# Altium PCB Power_vac.PcbDoc (part 1 of 5)
Units mm, origin at the board's own origin, x right, y up, seen from the top; angles counter-clockwise.
Board outline 180 x 212 mm, 4 copper layers (Top Layer, Int1 (GND), Int2 (PWR), Bottom Layer), stack 2.01 mm thick; 296 components, 149 nets, 798 pads, 522 vias.
Unrouted connection lines stored in the file: 1.
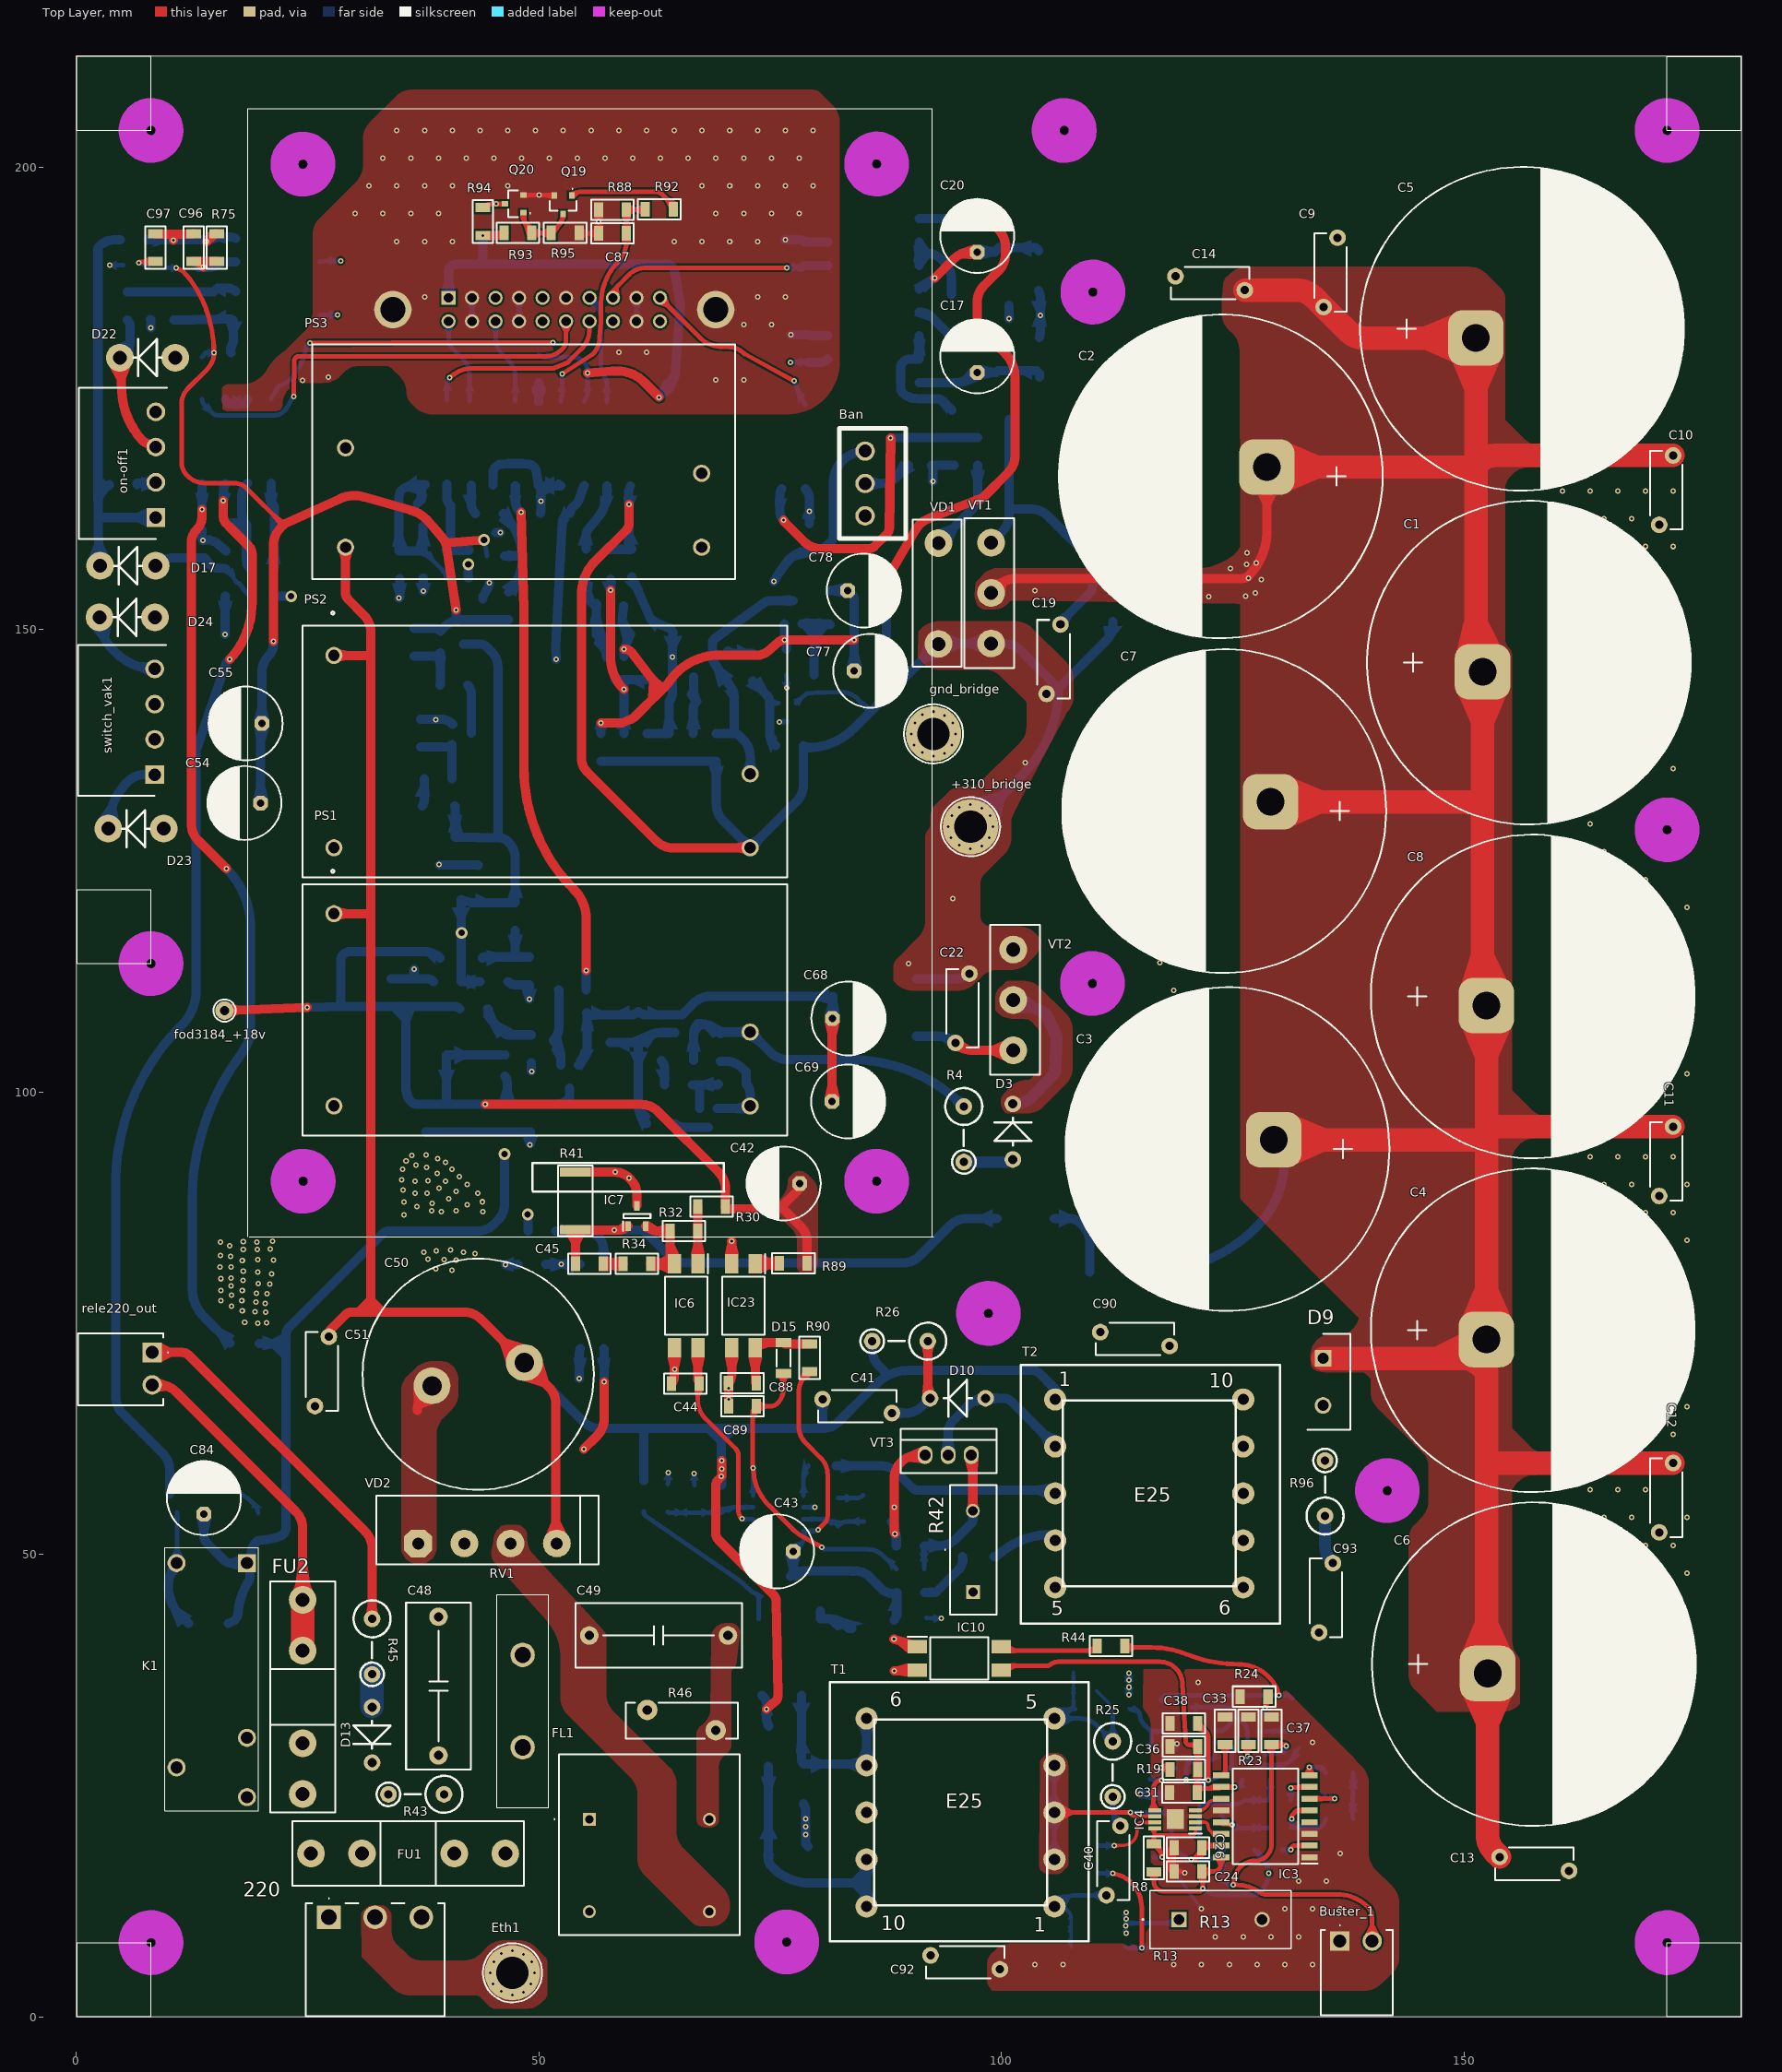
[diagram p0: Top Layer view]
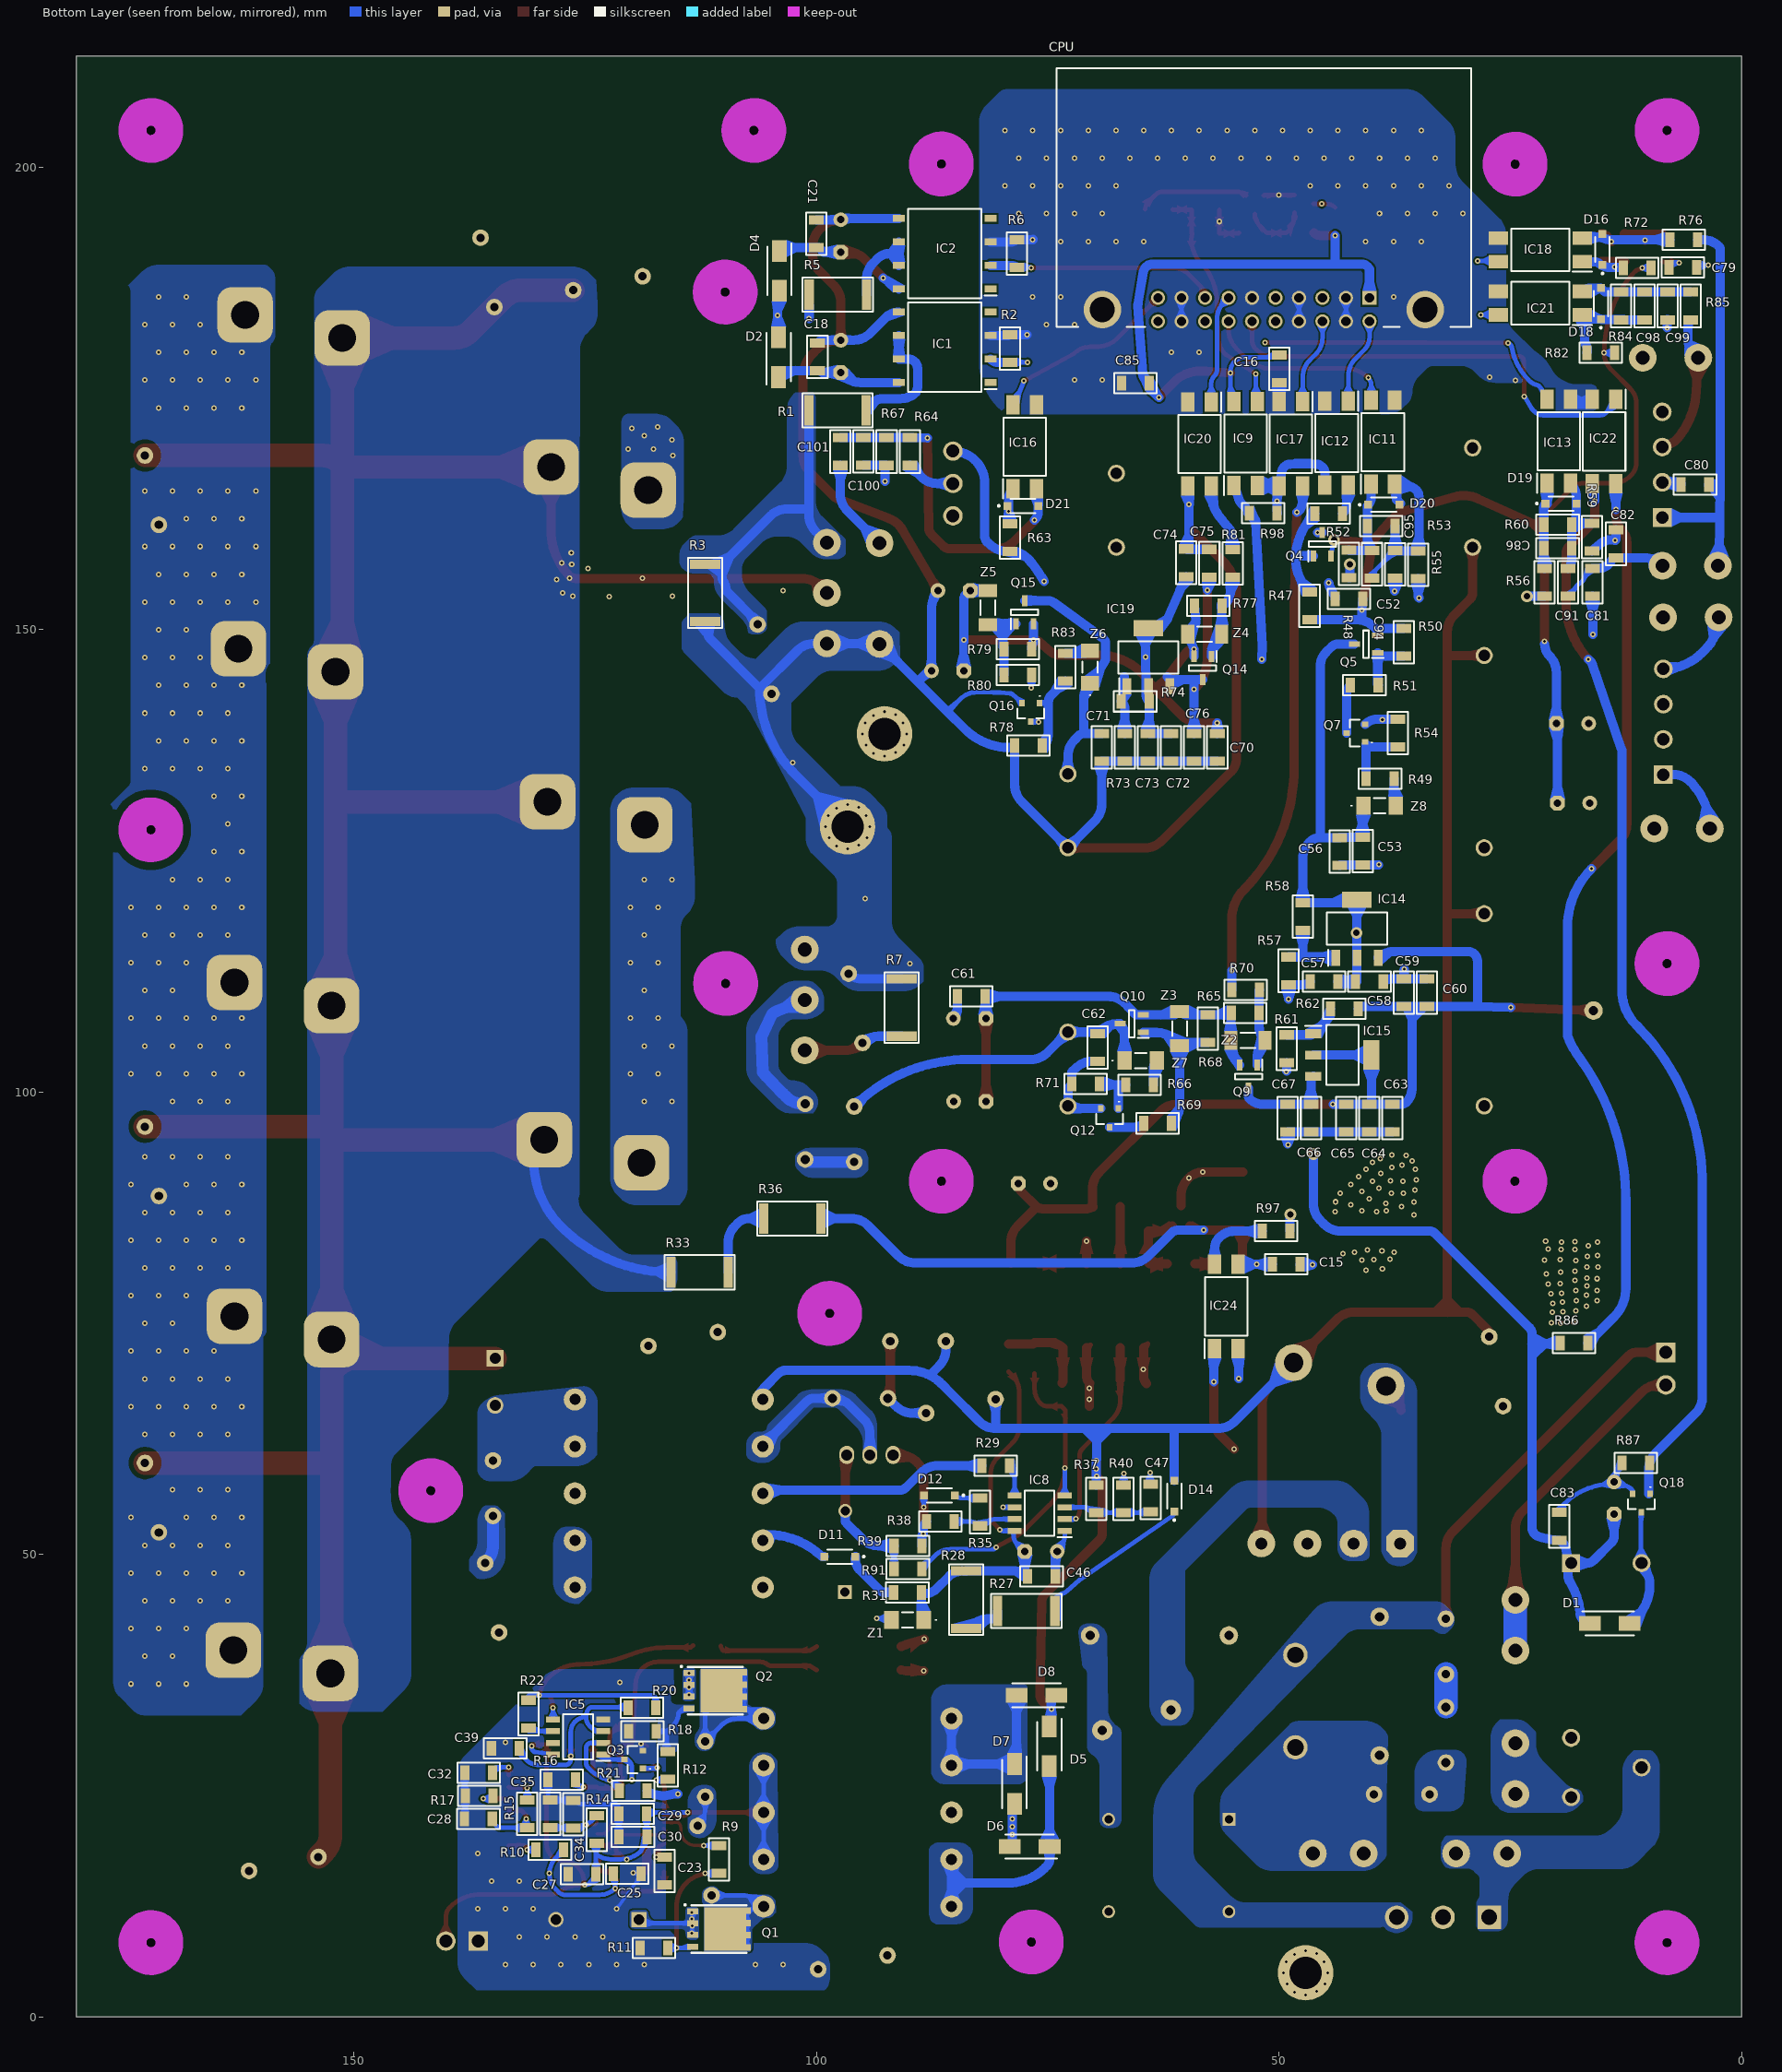
[diagram p1: Bottom Layer view, seen from below]
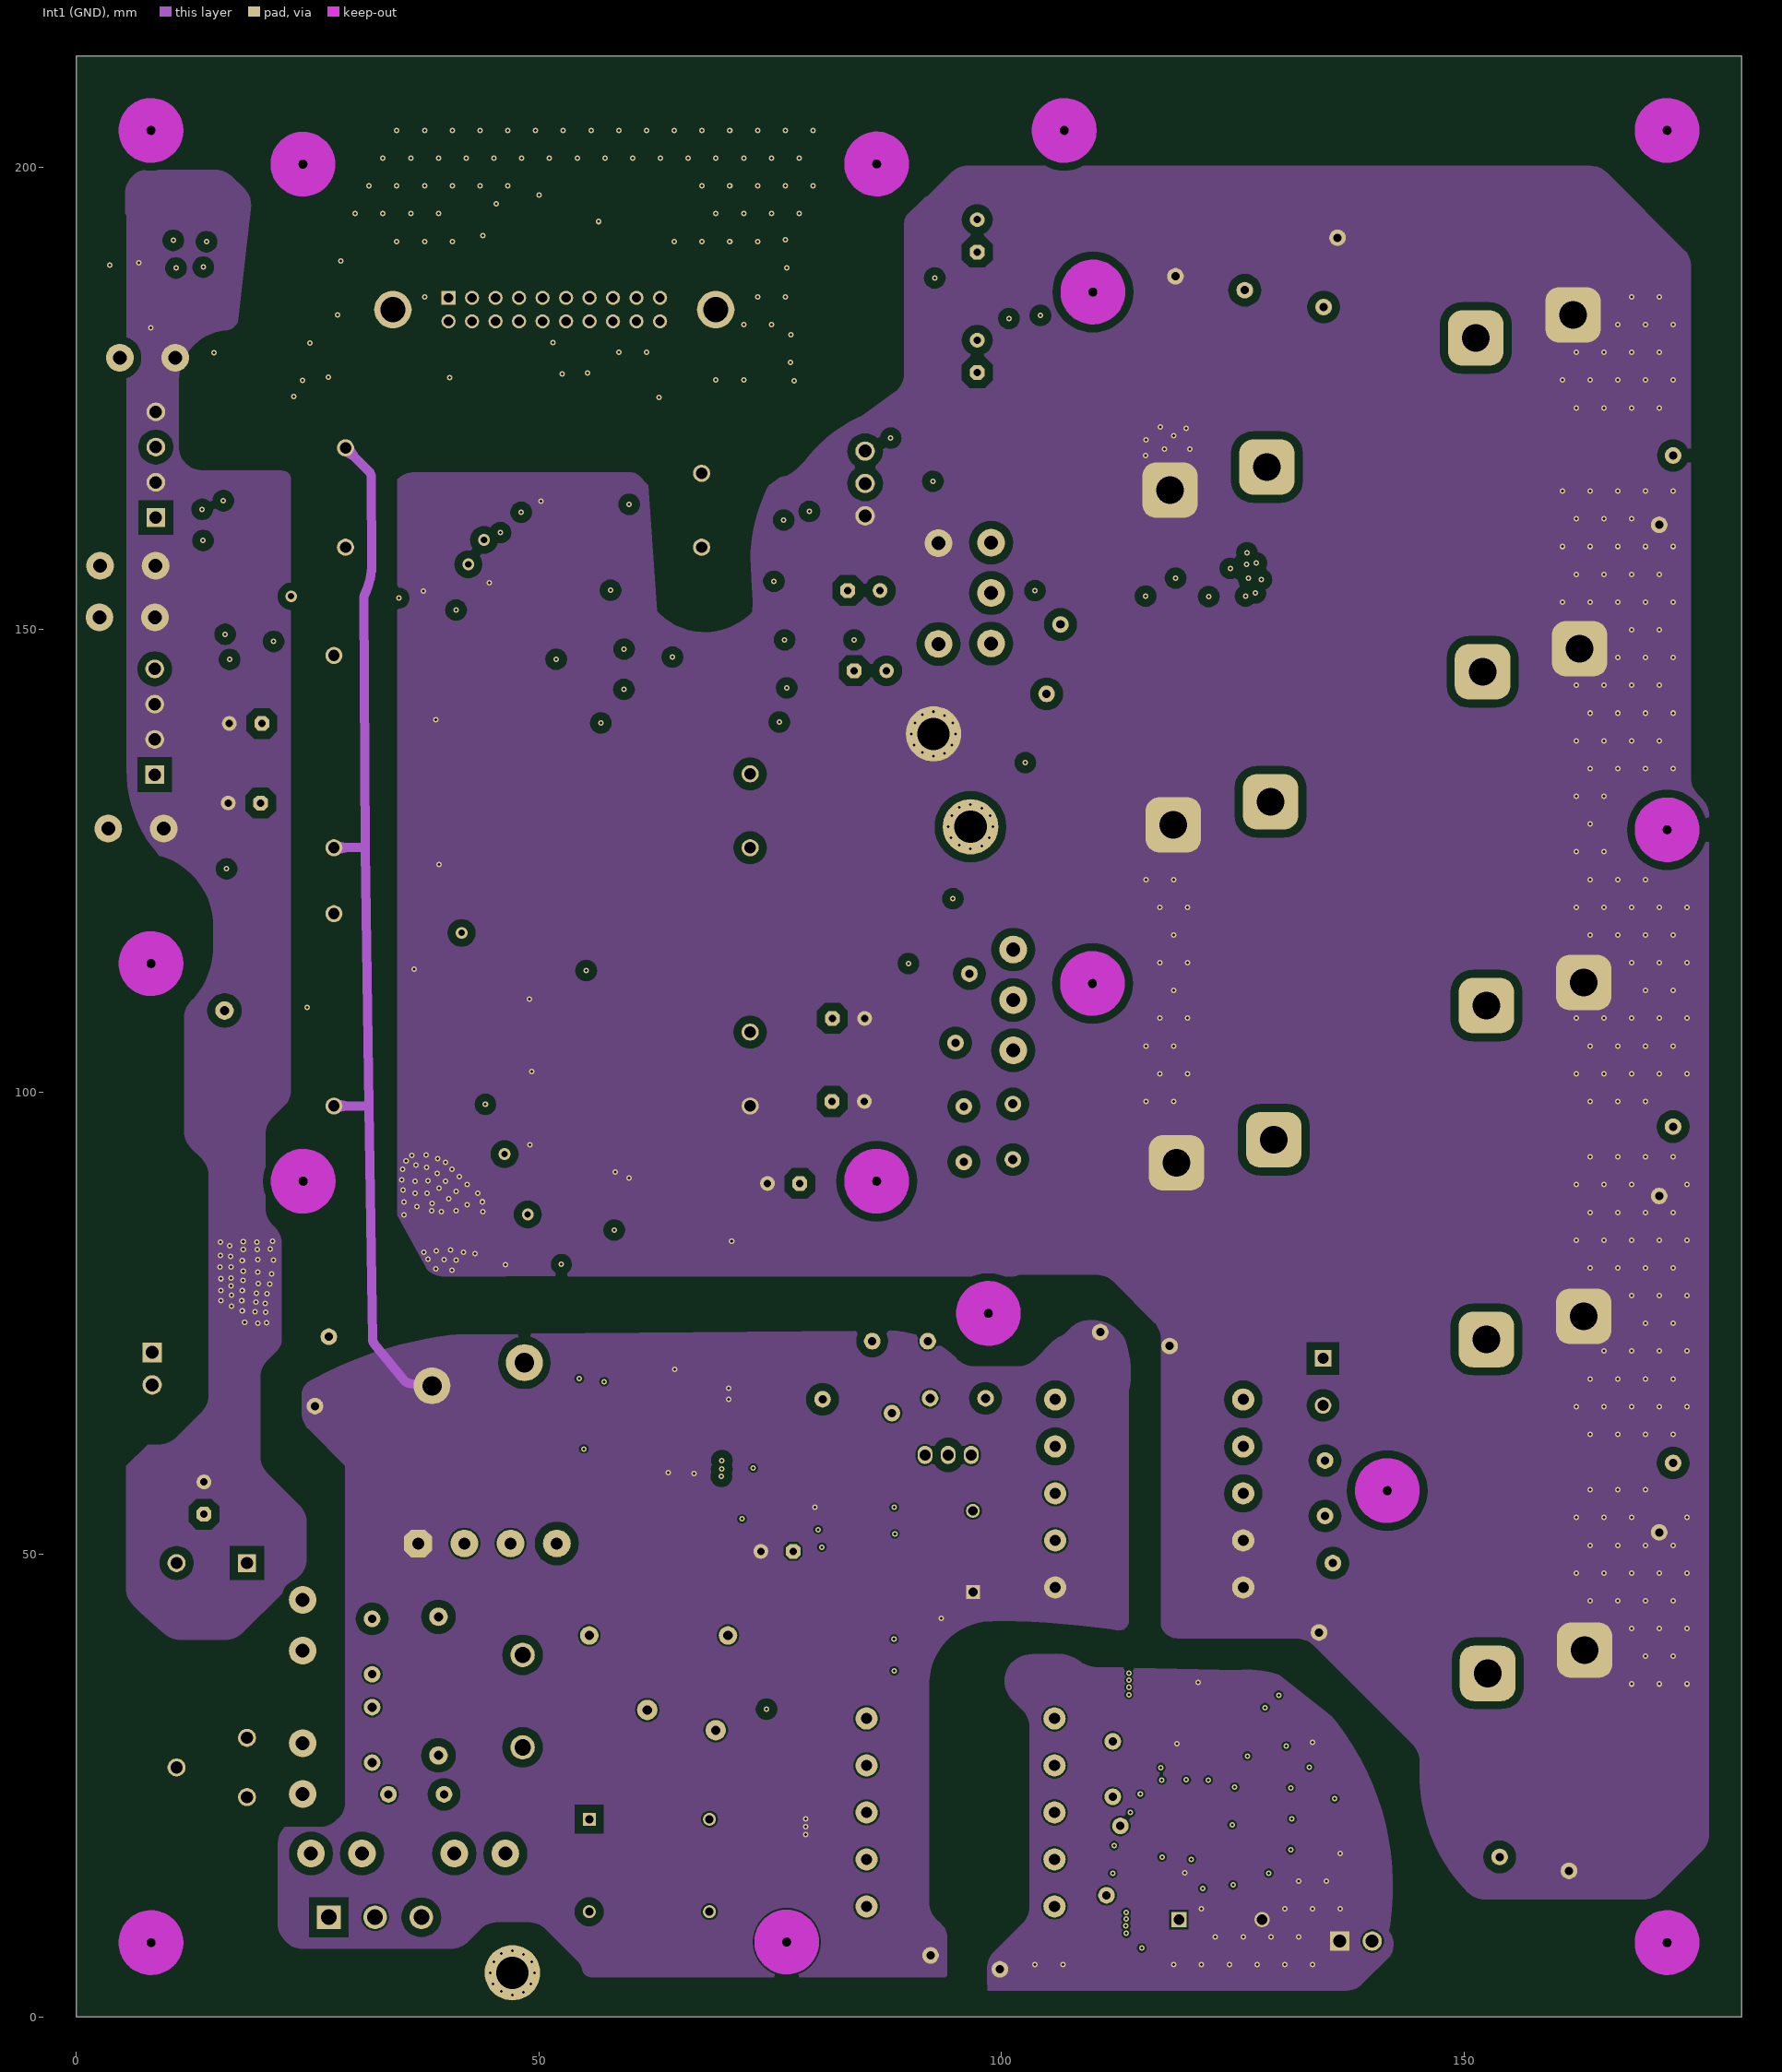
[diagram p2: Int1 (GND)]
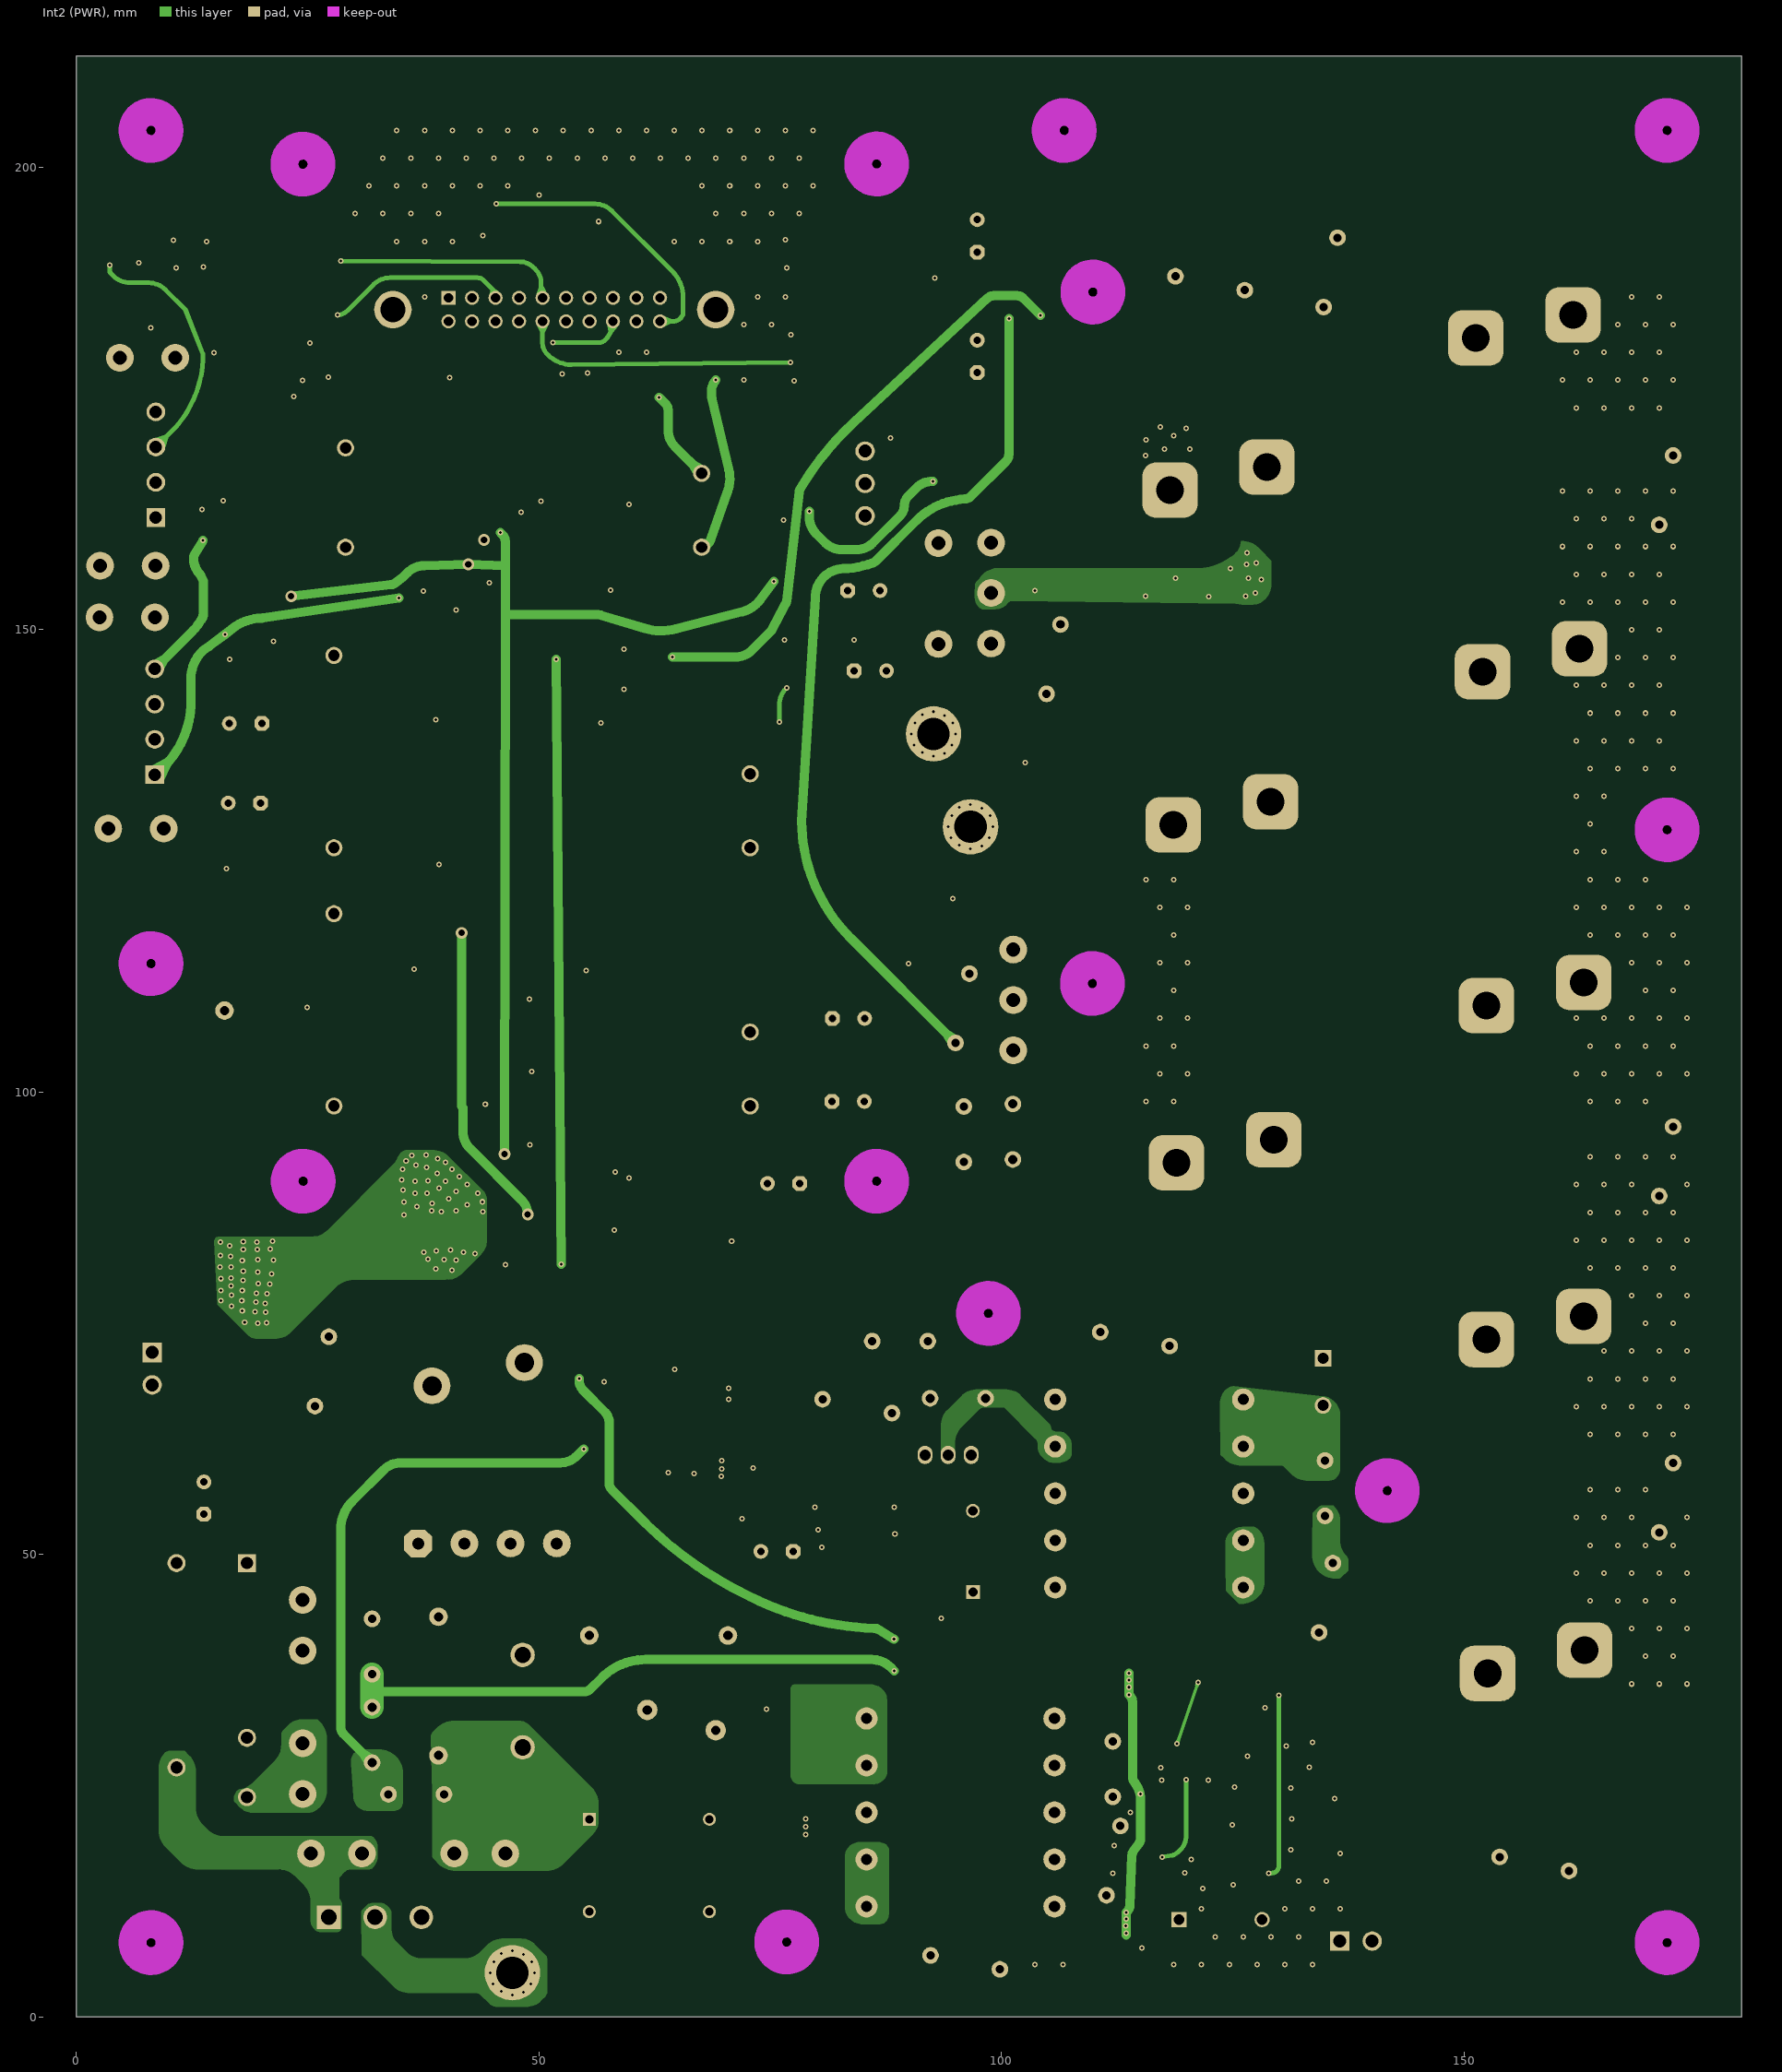
[diagram p3: Int2 (PWR)]
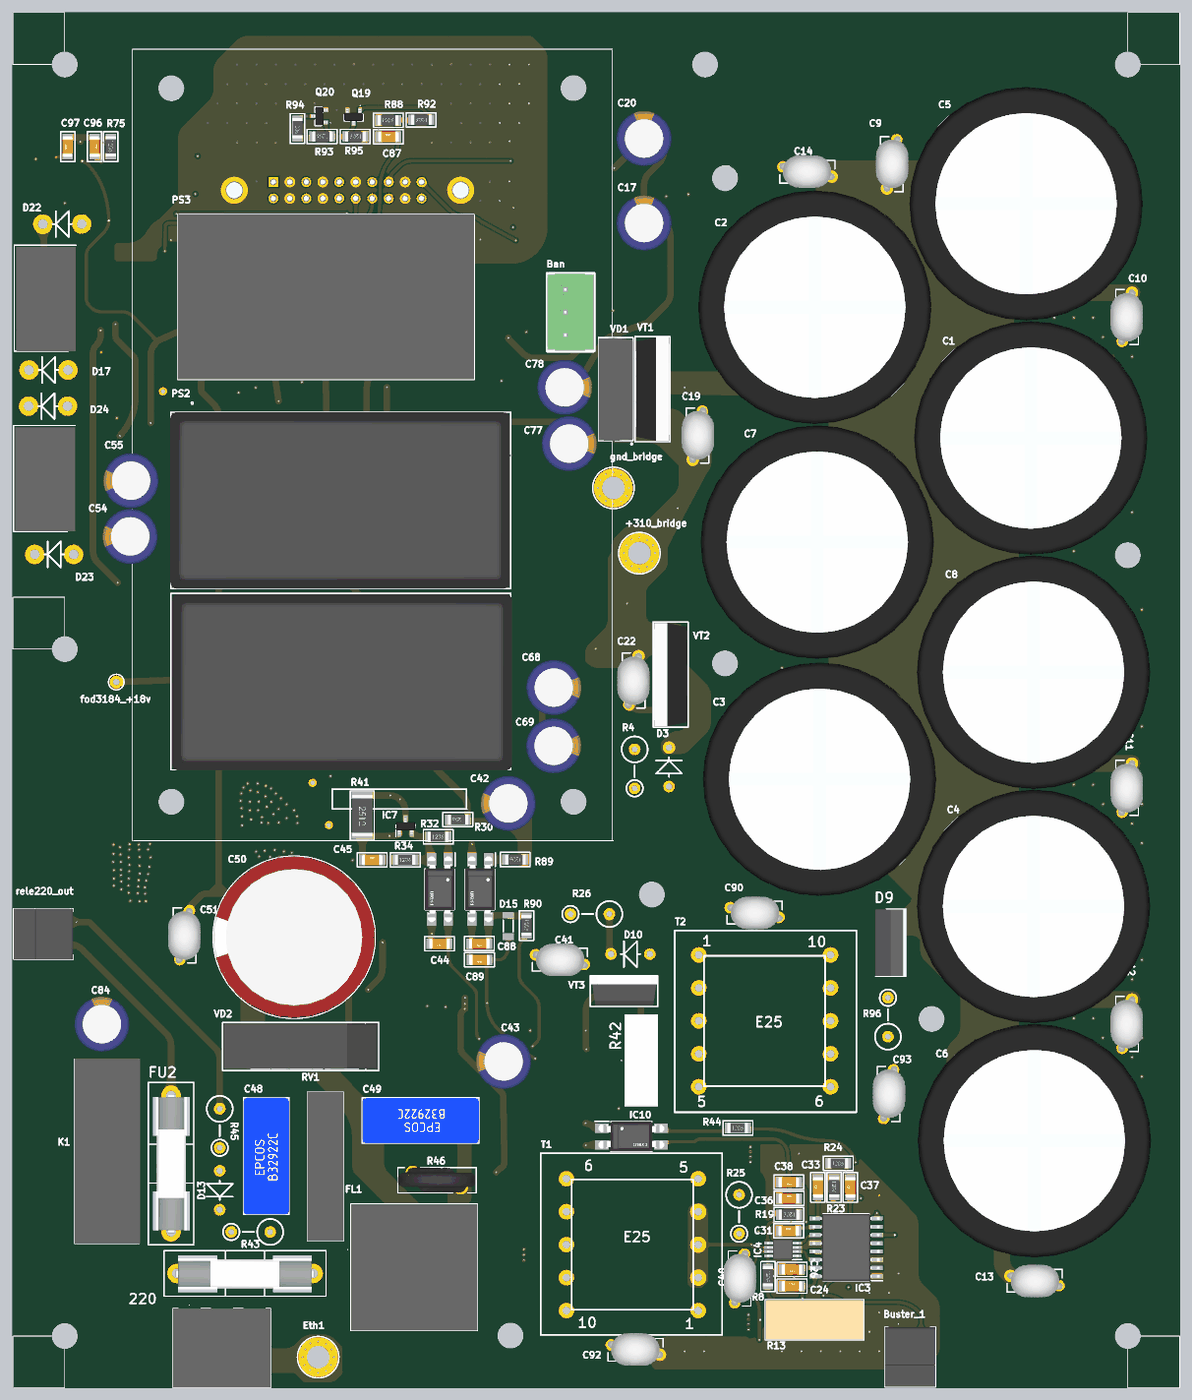
[diagram p7: 3D render of the assembled board from above, using the file's embedded part models]
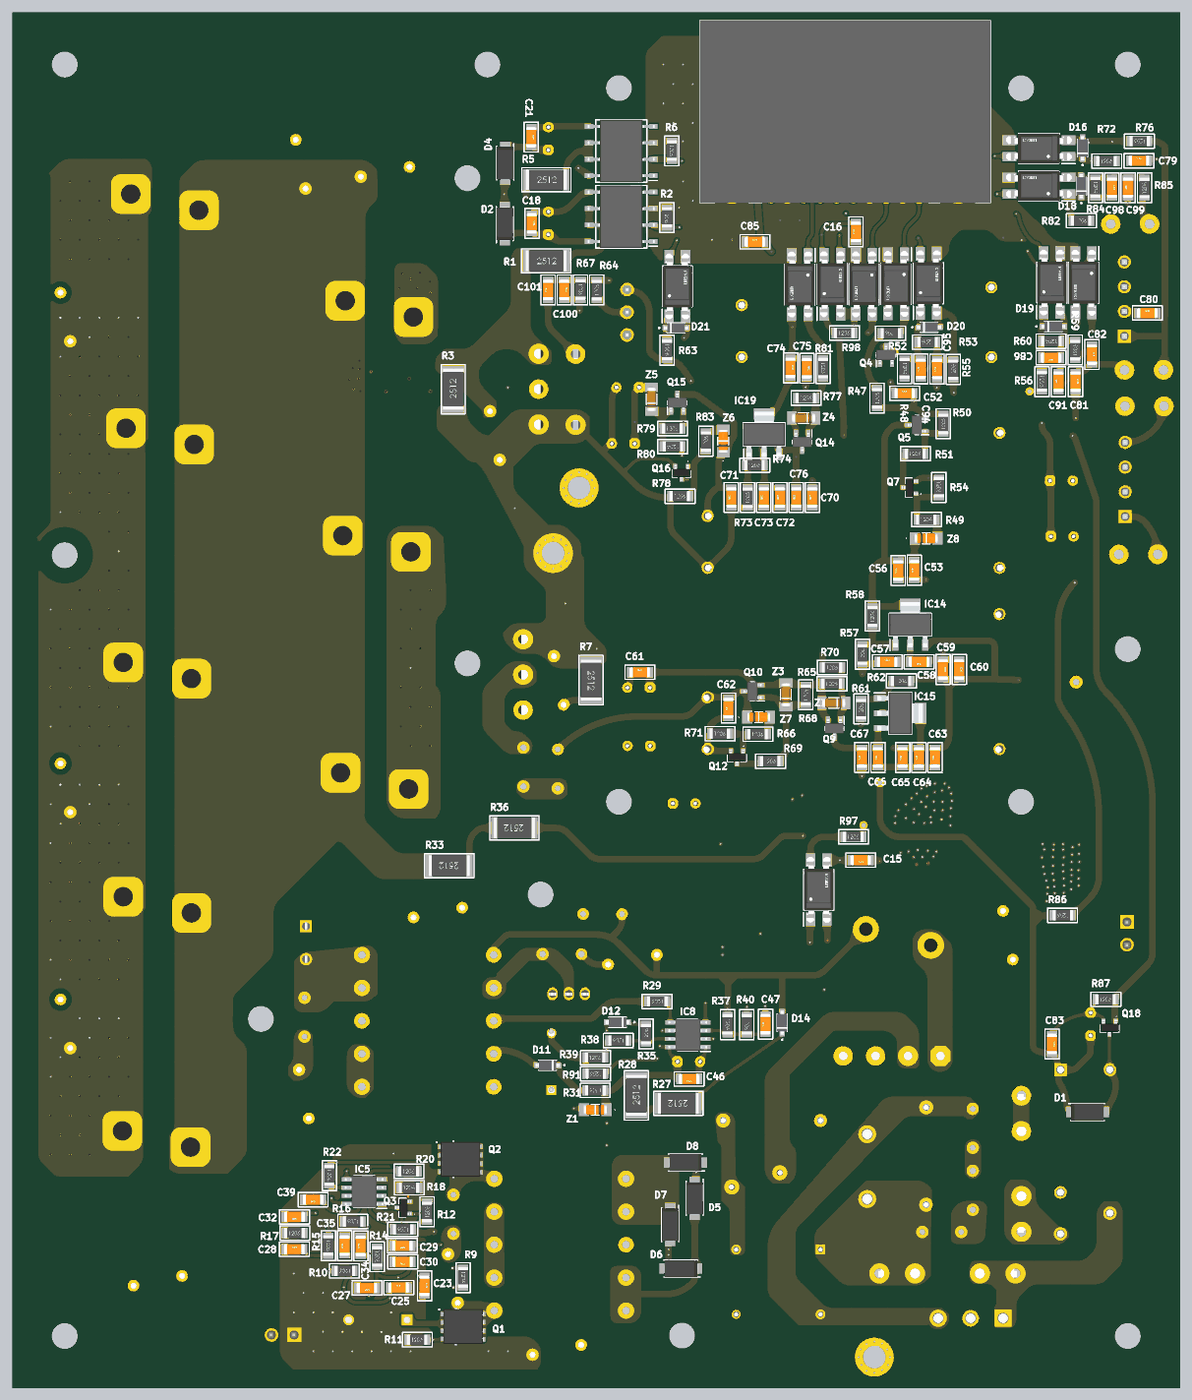
[diagram p8: 3D render of the assembled board from below, using the file's embedded part models]

## Layer stack, top to bottom
Top Solder: solder mask 0.0254, SM-001, Dk 4
Top Layer: signal copper 0.07
Dielectric 1: prepreg 0.2, PP-017, Dk 4.3
Dielectric 2: prepreg 0.2, PP-017, Dk 4.3
Int1 (GND): signal copper 0.035
Dielectric 3: core 1, Core-039, Dk 4.8
Int2 (PWR): signal copper 0.035
Dielectric 4: prepreg 0.2, PP-017, Dk 4.3
Dielectric 5: prepreg 0.2, PP-017, Dk 4.3
Bottom Layer: signal copper 0.07
Bottom Solder: solder mask 0.0254, SM-001, Dk 4

## Board outline
0,0 180,0 180,212 0,212
cut-out: 106.778,201.981 cw(c106.778,203.981) 104.778,203.981 cw(c106.778,203.981) 106.778,205.981 cw(c106.778,203.981) 108.778,203.981 cw(c106.778,203.981)
cut-out: 109.855,184.456 cw(c109.855,186.456) 107.855,186.456 cw(c109.855,186.456) 109.855,188.456 cw(c109.855,186.456) 111.855,186.456 cw(c109.855,186.456)
cut-out: 141.703,54.881 cw(c141.703,56.881) 139.703,56.881 cw(c141.703,56.881) 141.703,58.881 cw(c141.703,56.881) 143.703,56.881 cw(c141.703,56.881)
cut-out: 109.855,109.681 cw(c109.855,111.681) 107.855,111.681 cw(c109.855,111.681) 109.855,113.681 cw(c109.855,111.681) 111.855,111.681 cw(c109.855,111.681)
cut-out: 171.953,201.981 cw(c171.953,203.981) 169.953,203.981 cw(c171.953,203.981) 171.953,205.981 cw(c171.953,203.981) 173.953,203.981 cw(c171.953,203.981)
cut-out: 171.953,126.35 ccw(c171.953,128.35) 173.953,128.35 ccw(c171.953,128.35) 171.953,130.35 ccw(c171.953,128.35) 169.953,128.35 ccw(c171.953,128.35)
cut-out: 169.953,8.006 cw(c171.953,8.006) 171.953,10.006 cw(c171.953,8.006) 173.953,8.006 cw(c171.953,8.006) 171.953,6.006 cw(c171.953,8.006)
cut-out: 98.578,74.056 cw(c98.578,76.056) 96.578,76.056 cw(c98.578,76.056) 98.578,78.056 cw(c98.578,76.056) 100.578,76.056 cw(c98.578,76.056)
cut-out: 86.5,88.35 ccw(c86.5,90.35) 88.5,90.35 ccw(c86.5,90.35) 86.5,92.35 ccw(c86.5,90.35) 84.5,90.35 ccw(c86.5,90.35)
cut-out: 86.5,198.35 cw(c86.5,200.35) 84.5,200.35 cw(c86.5,200.35) 86.5,202.35 cw(c86.5,200.35) 88.5,200.35 cw(c86.5,200.35)
cut-out: 24.475,198.325 ccw(c24.475,200.325) 26.475,200.325 ccw(c24.475,200.325) 24.475,202.325 ccw(c24.475,200.325) 22.475,200.325 ccw(c24.475,200.325)
cut-out: 8.05,201.981 cw(c8.05,203.981) 6.05,203.981 cw(c8.05,203.981) 8.05,205.981 cw(c8.05,203.981) 10.05,203.981 cw(c8.05,203.981)
cut-out: 76.775,6.075 cw(c76.775,8.075) 74.775,8.075 cw(c76.775,8.075) 76.775,10.075 cw(c76.775,8.075) 78.775,8.075 cw(c76.775,8.075)
cut-out: 22.5,90.35 cw(c24.5,90.35) 24.5,92.35 cw(c24.5,90.35) 26.5,90.35 cw(c24.5,90.35) 24.5,88.35 cw(c24.5,90.35)
cut-out: 8.053,111.881 cw(c8.053,113.881) 6.053,113.881 cw(c8.053,113.881) 8.053,115.881 cw(c8.053,113.881) 10.053,113.881 cw(c8.053,113.881)
cut-out: 6.053,8.006 cw(c8.053,8.006) 8.053,10.006 cw(c8.053,8.006) 10.053,8.006 cw(c8.053,8.006) 8.053,6.006 cw(c8.053,8.006)

## Design rules (kind name [scope] priority, off if disabled: settings)
AcuteAngle [All] p1: minimum=3.50000000000000E+0001 checktracksonly=FALSE
BoardOutlineClearance "BoardOutlineClearance 1" [OnCopper] p1: gap=0.5 ignorepadtopadclearanceinfootprint=FALSE except(0: Text-SplitContinuation; 0.25: Text-OutlineEdge Text-CavityEdge Text-CutoutEdge Text-SplitBarrior) // Milling
BoardOutlineClearance "BoardOutlineClearance 2" [All] p2 off: gap=0.4 ignorepadtopadclearanceinfootprint=FALSE except(0: Arc-SplitContinuation Track-SplitContinuation SMDPad-SplitContinuation THPad-SplitContinuation Via-SplitContinuation Fill-SplitContinuation Poly-SplitContinuation Region-SplitContinuation Text-SplitContinuation) // V-Cut
Clearance Clearance_310v [InNetClass('310v')] p1: gap=0.85 ignorepadtopadclearanceinfootprint=FALSE except(0.1: Text-Text; 0.25: Text-Hole)
Clearance "Clearance-1 1 Oz" [All] p2: gap=0.2 ignorepadtopadclearanceinfootprint=TRUE except(0.25: Arc-Hole Track-Hole SMDPad-Hole THPad-Hole Via-Hole Fill-Hole Poly-Hole Region-Hole Text-Hole) // Standart
Clearance "Clearance 3 Oz" [All] p3: gap=0.35 ignorepadtopadclearanceinfootprint=FALSE except(0.25: Arc-Hole Track-Hole SMDPad-Hole THPad-Hole Via-Hole Fill-Hole Poly-Hole Region-Hole Text-Hole)
Clearance "Clearance 2 Oz" [All] p4: gap=0.3 ignorepadtopadclearanceinfootprint=FALSE except(0.25: Arc-Hole Track-Hole SMDPad-Hole THPad-Hole Via-Hole Fill-Hole Poly-Hole Region-Hole Text-Hole)
Clearance "Clearance-2 1 Oz" [All] p5: gap=0.15 ignorepadtopadclearanceinfootprint=FALSE except(0.2: Arc-Fill Arc-Poly Track-Fill Track-Poly SMDPad-Fill SMDPad-Poly THPad-Fill THPad-Poly Via-Fill Via-Poly Fill-Fill Fill-Poly Poly-Poly; 0.25: Arc-Hole Track-Hole SMDPad-Hole THPad-Hole Via-Hole Fill-Hole Poly-Hole Region-Hole Text-Hole) // Advance
Clearance "Clearance-1 1/2 Oz" [All] p6: gap=0.125 ignorepadtopadclearanceinfootprint=FALSE except(0.2: Arc-Fill Arc-Poly Track-Fill Track-Poly SMDPad-SMDPad SMDPad-Fill SMDPad-Poly THPad-Fill THPad-Poly Via-Fill Via-Poly Fill-Fill Fill-Poly Poly-Poly Poly-Region Poly-Text; 0.25: Arc-Hole Track-Hole SMDPad-Hole THPad-Hole Via-Hole Fill-Hole Poly-Hole Region-Hole Text-Hole) // Standart
Clearance "Clearance-2 1/2 Oz" [All] p7: gap=0.1 ignorepadtopadclearanceinfootprint=FALSE except(0.15: Arc-Fill Arc-Poly Track-Fill Track-Poly SMDPad-SMDPad SMDPad-Fill SMDPad-Poly THPad-Fill THPad-Poly Via-Fill Via-Poly Fill-Fill Fill-Poly Poly-Poly Poly-Region Poly-Text; 0.25: Arc-Hole Track-Hole SMDPad-Hole THPad-Hole Via-Hole Fill-Hole Poly-Hole Region-Hole Text-Hole) // Advance
ComponentClearance [All] p1: gap=0.1 collisioncheckmode=3 verticalgap=0 showdistances=FALSE
DiffPairsRouting "DiffPairsRouting 1 Oz" [All] p1: maxlimit=0.254 minlimit=0.2 mostfreqgap=0.254 toplayer_minwidth=0.2 toplayer_maxwidth=0.381 toplayer_prefwidth=0.381 midlayer1_minwidth=0.2 midlayer1_maxwidth=0.381 midlayer1_prefwidth=0.381 midlayer2_minwidth=0.2 midlayer2_maxwidth=0.381 midlayer2_prefwidth=0.381 bottomlayer_minwidth=0.2 bottomlayer_maxwidth=0.381 bottomlayer_prefwidth=0.381 maxuncoupledlength=12.7
DiffPairsRouting "DiffPairsRouting 1/2 Oz" [All] p2: maxlimit=0.254 minlimit=0.1 mostfreqgap=0.254 toplayer_minwidth=0.1 toplayer_maxwidth=0.381 toplayer_prefwidth=0.381 midlayer1_minwidth=0.1 midlayer1_maxwidth=0.381 midlayer1_prefwidth=0.381 midlayer2_minwidth=0.1 midlayer2_maxwidth=0.381 midlayer2_prefwidth=0.381 bottomlayer_minwidth=0.1 bottomlayer_maxwidth=0.381 bottomlayer_prefwidth=0.381 maxuncoupledlength=12.7
Height [All] p1: minheight=0 maxheight=60 prefheight=30
HoleSize "Minimum HoleSize" [IsPad] p1: absolutevalues=TRUE maxlimit=9 minlimit=0.3 maxpercent=80.000 minpercent=20.000
HoleSize "Minimum HoleSize VIA 1" [IsVia] p2: absolutevalues=TRUE maxlimit=5.9 minlimit=0.3 maxpercent=80.000 minpercent=20.000 // Standart
HoleSize "Minimum HoleSize VIA 2" [IsVia] p3: absolutevalues=TRUE maxlimit=5.9 minlimit=0.2 maxpercent=80.000 minpercent=20.000 // Advance
HoleToHoleClearance Hole2HoleClearance [All] p1: gap=0.25 allowstackedmicrovias=FALSE
MinimumAnnularRing "Minimum AR VIA Standart" [IsVia] p1: minimumring=0.1
MinimumAnnularRing "Minimum AR PAD Standart" [IsPAD] p2 off: minimumring=0.2
MinimumAnnularRing "Minimum AR VIA Advance" [IsVia] p3 off: minimumring=0.1
MinimumAnnularRing "Minimum AR PAD Advance" [IsPAD] p4 off: minimumring=0.15
MinimumSolderMaskSliver "SolderMask Bridge Standart" [All] p1: minsoldermaskwidth=0.1 // All Masks
MinimumSolderMaskSliver "SolderMask Bridge Advance" [All] p2: minsoldermaskwidth=0.1 // Mask LDI
PlaneClearance "PlaneClearance 3 Oz" [All] p1: clearance=0.35
PlaneClearance "PlaneClearance 2 Oz" [All] p2: clearance=0.3
PlaneClearance "PlaneClearance 1 Oz" [All] p3: clearance=0.2
PlaneClearance "PlaneClearance-1 1/2 Oz" [All] p4: clearance=0.2 // Standart
PlaneClearance "PlaneClearance-2 1/2 Oz" [All] p5: clearance=0.15 // Advance
PlaneConnect "TermalConnect 3 Oz" [All] p1: planeconnectstyle=Direct reliefexpansion=0.2 reliefentries=4 reliefconductorwidth=0.35 reliefairgap=0.35 // Standart
PlaneConnect "TermalConnect 2 Oz" [All] p2: planeconnectstyle=Relief reliefexpansion=0.2 reliefentries=4 reliefconductorwidth=0.3 reliefairgap=0.3 // Standart
PlaneConnect "TermalConnect-1 1 Oz" [All] p3: planeconnectstyle=Relief reliefexpansion=0.2 reliefentries=4 reliefconductorwidth=0.2 reliefairgap=0.2 // Standart
PlaneConnect "TermalConnect-2 1 Oz" [All] p4: pad.planeconnectstyle=Relief pad.reliefexpansion=0.15 pad.reliefentries=4 pad.reliefconductorwidth=0.2 pad.reliefairgap=0.2 via.planeconnectstyle=Direct via.reliefexpansion=0.15 via.reliefentries=4 via.reliefconductorwidth=0.15 via.reliefairgap=0.15 // Advance
PlaneConnect "TermalConnect-1 1/2 Oz" [All] p5: planeconnectstyle=Direct reliefexpansion=0.2 reliefentries=4 reliefconductorwidth=0.2 reliefairgap=0.2 // Standart
PlaneConnect "TermalConnect-2 1/2 Oz" [All] p6: pad.planeconnectstyle=Relief pad.reliefexpansion=0.15 pad.reliefentries=4 pad.reliefconductorwidth=0.15 pad.reliefairgap=0.15 via.planeconnectstyle=Direct via.reliefexpansion=0.15 via.reliefentries=4 via.reliefconductorwidth=0.15 via.reliefairgap=0.15 // Advance
PolygonConnect "PolygonConnect 3 Oz" [All] p1: connectstyle=Direct reliefconductorwidth=0.35 reliefentries=4 polygonreliefangle="90 Angle" airgapwidth=0.35
PolygonConnect "PolygonConnect 2 Oz" [All] p2: thpad.connectstyle=Relief thpad.reliefconductorwidth=0.3 thpad.reliefentries=4 thpad.polygonreliefangle="90 Angle" thpad.airgapwidth=0.3 smdpad.connectstyle=Relief smdpad.reliefconductorwidth=0.3 smdpad.reliefentries=4 smdpad.polygonreliefangle="90 Angle" smdpad.airgapwidth=0.3 via.connectstyle=Direct via.reliefconductorwidth=0.254 via.reliefentries=4 via.polygonreliefangle="90 Angle" via.airgapwidth=0.254
PolygonConnect "PolygonConnect-1 1 Oz" [All] p3: thpad.connectstyle=Relief thpad.reliefconductorwidth=0.2 thpad.reliefentries=4 thpad.polygonreliefangle="90 Angle" thpad.airgapwidth=0.2 smdpad.connectstyle=Relief smdpad.reliefconductorwidth=0.2 smdpad.reliefentries=4 smdpad.polygonreliefangle="90 Angle" smdpad.airgapwidth=0.2 via.connectstyle=Direct via.reliefconductorwidth=0.254 via.reliefentries=4 via.polygonreliefangle="90 Angle" via.airgapwidth=0.254 // Standart
PolygonConnect "PolygonConnect-2 1 Oz" [All] p4: thpad.connectstyle=Relief thpad.reliefconductorwidth=0.15 thpad.reliefentries=4 thpad.polygonreliefangle="90 Angle" thpad.airgapwidth=0.15 smdpad.connectstyle=Relief smdpad.reliefconductorwidth=0.15 smdpad.reliefentries=4 smdpad.polygonreliefangle="90 Angle" smdpad.airgapwidth=0.15 via.connectstyle=Direct via.reliefconductorwidth=0.254 via.reliefentries=4 via.polygonreliefangle="90 Angle" via.airgapwidth=0.254 // Advance
PolygonConnect "PolygonConnect-1 1/2 Oz" [All] p5: thpad.connectstyle=Relief thpad.reliefconductorwidth=0.15 thpad.reliefentries=4 thpad.polygonreliefangle="90 Angle" thpad.airgapwidth=0.2 smdpad.connectstyle=Relief smdpad.reliefconductorwidth=0.2 smdpad.reliefentries=4 smdpad.polygonreliefangle="90 Angle" smdpad.airgapwidth=0.2 via.connectstyle=Direct via.reliefconductorwidth=0.254 via.reliefentries=4 via.polygonreliefangle="90 Angle" via.airgapwidth=0.254 // Standart
PolygonConnect "PolygonConnect-2 1/2 Oz" [All] p6: thpad.connectstyle=Relief thpad.reliefconductorwidth=0.125 thpad.reliefentries=4 thpad.polygonreliefangle="90 Angle" thpad.airgapwidth=0.15 smdpad.connectstyle=Relief smdpad.reliefconductorwidth=0.125 smdpad.reliefentries=4 smdpad.polygonreliefangle="90 Angle" smdpad.airgapwidth=0.15 via.connectstyle=Direct via.reliefconductorwidth=0.254 via.reliefentries=4 via.polygonreliefangle="90 Angle" via.airgapwidth=0.254 // Advance
RoutingCorners [All] p1 off: cornerstyle=45-Degree minsetback=2.54 maxsetback=2.54
RoutingVias [All] p1: holewidth=0.3 width=0.6 viastyle="Through Hole" minholewidth=0.2 minwidth=0.4 maxholewidth=5.9 maxwidth=6.4
SilkToSilkClearance Silk2SilkClearance [All] p1 off: silktosilkclearance=0.15
SilkToSolderMaskClearance Silk2SolderMaskClearance [IsPad] p1 off: minsilkscreentomaskgap=0.1 clearancetoexposedcopper=TRUE
SolderMaskExpansion SolderMaskExpansion-1 [All] p1: expansion=0.05 istentingtop=FALSE // Standart
SolderMaskExpansion "SolderMaskExpansion LDI" [All] p2: expansion=0.025 istentingtop=FALSE // Advance
SupplyNets "Schematic Supply Nets_2" [InNet('Eth')] p1: voltage=0.000
SupplyNets "Schematic Supply Nets_4" [InNet('GND_N')] p2: voltage=0.000
SupplyNets "Schematic Supply Nets_3" [InNet('GND_akum')] p3: voltage=0.000
SupplyNets "Schematic Supply Nets_1" [InNet('GND_digit')] p4: voltage=0.000
SupplyNets "Schematic Supply Nets" [InNet('GND_force')] p5: voltage=0.000
UnRoutedNet [All] p1: checkbadconnections=TRUE
Width "Width 3 Oz" [All] p1: maxlimit=10 minlimit=0.35 preferedwidth=0.4 checkconnectedcopper=TRUE
Width "Width 2 Oz" [All] p2: maxlimit=10 minlimit=0.3 preferedwidth=0.35 minimp=50.000000 maximp=50.000000 favimp=50.000000 checkconnectedcopper=TRUE
Width "Width 1 Oz" [All] p3: maxlimit=10 minlimit=0.15 preferedwidth=0.2 checkconnectedcopper=TRUE
Width "Width 1/2 Oz" [All] p4: maxlimit=10 minlimit=0.1 preferedwidth=0.125 checkconnectedcopper=TRUE
18 further rules are at their usual default settings.

## Classes and differential pairs
net class 310v: 220_L 220_L_Fuse 220_N 310v GND_force NetD10_1 Out_310_to_bridge Power_trans
component class Remove_from_CPU_to_Power: C52 C53 C54 C55 C56 C57 C58 C59 C60 C61 C62 C63 C64 C65 C66 C67 C68 C69 C70 C71 C72 C73 C74 C75 C76 C77 C78 C83 C84 C86 C91 C94 C95 C96 C97 C98 C99 C100 C101 D1 D16 D17 D18 D19 D20 D21 D22 D23 D24 FU2 IC11 IC12 IC13 IC14 IC15 IC16 IC17 IC18 IC19 IC20 IC21 IC22 K1 Q4 Q5 Q7 Q9 Q10 Q12 Q14 Q15 Q16 Q18 R47 R48 R49 R50 R51 R52 R53 R54 R55 R56 R57 R58 R59 R60 R61 R62 R63 R64 R65 R66 R67 R68 R69 R70 R71 R72 R73 R74 R75 R76 R77 R78 R79 R80 R81 R82 R83 R84 R85 R86 R87 Z2 Z3 Z4 Z5 Z6 Z7 Z8
component class Transform_310_3_24_24: C85 PS1 PS2 PS3
component class Filtr_220: C48 C49 C50 C51 D14 FL1 FU1 R46 RV1 VD2
component class Transform_310_310: C41 C42 C43 C44 C45 C46 C47 C88 C89 C90 C93 D9 D10 D11 D12 D15 IC6 IC7 IC8 IC23 R26 R27 R28 R29 R30 R31 R32 R33 R34 R35 R36 R37 R38 R39 R40 R41 R42 R89 R90 R91 R96 T2 VT3 Z1
component class Transform_12_310: C23 C24 C25 C26 C27 C28 C29 C30 C31 C32 C33 C34 C35 C36 C37 C38 C39 C40 C92 D5 D6 D7 D8 IC3 IC4 IC5 Q1 Q2 Q3 R8 R9 R10 R11 R12 R13 R14 R15 R16 R17 R18 R19 R20 R21 R22 R23 R24 R25 T1
component class Detect_220: C15 C16 C87 D13 IC9 IC10 IC24 Q19 Q20 R43 R44 R45 R88 R92 R93 R94 R95 R97 R98
component class Hard_rele_310v_24v_test: C17 C18 C19 C20 C21 C22 D2 D3 D4 IC1 IC2 R1 R2 R3 R4 R5 R6 R7 VD1 VT1 VT2
component class Cnnectors_power1: 220 +310_bridge Ban Buster_1 C79 C80 C81 C82 CPU Eth1 fod3184_+18v gnd_bridge on-off1 rele220_out switch_vak1
component class Capasitors_vac: C1 C2 C3 C4 C5 C6 C7 C8 C9 C10 C11 C12 C13 C14

## Components (designator, comment, footprint, x,y, rotation, side; value= is the part's Value field where it differs from the comment)
220 "WJ2EDGR-5.0-3P" WJ2EDGR503P 27.275,10.75 r0 top
+310_bridge "Power connector, *, *" "CON: TH 3.5mm" 96.65,128.675 r90 top
Ban "Terminal connector, 3pin, 3.5mm, 300VAC, 10A" "CON: 15EDGVC-3.5-03 (or 691321100003)" 86.05,165.8 r270 top
Buster_1 "15EDGRC-3.5-02P-13-00AH" 15EDGRC3502P1300AH 136.575,8.175 r180 top
C1 "Aluminium capacitor, 680μF, 450V, ±20%, 54mOhm, 14x10x5 mm, -55...+105°C" "CAP: D35C10H40" 152,145.425 r0 top locked value=680μF
C2 "Aluminium capacitor, 680μF, 450V, ±20%, 54mOhm, 14x10x5 mm, -55...+105°C" "CAP: D35C10H40" 128.7,167.575 r180 top locked value=680μF
C3 "Aluminium capacitor, 680μF, 450V, ±20%, 54mOhm, 14x10x5 mm, -55...+105°C" "CAP: D35C10H40" 129.425,94.825 r180 top locked value=680μF
C4 "Aluminium capacitor, 680μF, 450V, ±20%, 54mOhm, 14x10x5 mm, -55...+105°C" "CAP: D35C10H40" 152.425,73.224 r0 top locked value=680μF
C5 "Aluminium capacitor, 680μF, 450V, ±20%, 54mOhm, 14x10x5 mm, -55...+105°C" "CAP: D35C10H40" 151.275,181.525 r0 top locked value=680μF
C6 "Aluminium capacitor, 680μF, 450V, ±20%, 54mOhm, 14x10x5 mm, -55...+105°C" "CAP: D35C10H40" 152.55,37.124 r0 top locked value=680μF
C7 "Aluminium capacitor, 680μF, 450V, ±20%, 54mOhm, 14x10x5 mm, -55...+105°C" "CAP: D35C10H40" 129.075,131.375 r180 top locked value=680μF
C8 "Aluminium capacitor, 680μF, 450V, ±20%, 54mOhm, 14x10x5 mm, -55...+105°C" "CAP: D35C10H40" 152.425,109.324 r0 top locked value=680μF
C9 "Film capacitor, 1n, 2kV, ±10%, 10.9mOhm, 31.5x15 mm, -40...+105°C" "CAP: AY2102M29Y5US63L7" 134.825,184.875 r90 top value=1n
C10 "Film capacitor, 1n, 2kV, ±10%, 10.9mOhm, 31.5x15 mm, -40...+105°C" "CAP: AY2102M29Y5US63L7" 172.6,168.825 r270 top value=1n
C11 "Film capacitor, 1n, 2kV, ±10%, 10.9mOhm, 31.5x15 mm, -40...+105°C" "CAP: AY2102M29Y5US63L7" 172.6,96.25 r270 top value=1n
C12 "Film capacitor, 1n, 2kV, ±10%, 10.9mOhm, 31.5x15 mm, -40...+105°C" "CAP: AY2102M29Y5US63L7" 172.6,59.875 r270 top value=1n
C13 "Film capacitor, 1n, 2kV, ±10%, 10.9mOhm, 31.5x15 mm, -40...+105°C" "CAP: AY2102M29Y5US63L7" 153.85,17.275 r0 top value=1n
C14 "Film capacitor, 1n, 2kV, ±10%, 10.9mOhm, 31.5x15 mm, -40...+105°C" "CAP: AY2102M29Y5US63L7" 126.3,186.7 r180 top value=1n
C15 "Ceramic capacitor, 100n, X7R, ±10%, 50V, 1206, -55...+125°C" "CAP: 1206" 49.225,81.35 r0 bottom value=100n
C16 "Ceramic capacitor, 60u, X7R, ±10%, 10v, 1206, -55...+125°C" "CAP: 1206" 49.975,178.2 r90 bottom value=60u
C17 "Aluminium capacitor, 100u, 25V, ±20%, 54mOhm, 14x10x5 mm, -55...+105°C" "CAP: D8C3.5H12" 97.375,179.55 r90 top value=100u
C18 "Ceramic capacitor, 1μF, X7R, ±10%, 50V, 1206, -55...+125°C" "CAP: 1206" 99.9,179.5 r270 bottom value=1μF
C19 "Film capacitor, 1n, 2kv, ±10%, 10.9mOhm, 31.5x15 mm, -40...+105°C" "CAP: AY2102M29Y5US63L7" 104.875,143.05 r90 top value=1n
C20 "Aluminium capacitor, 100u, 25V, ±20%, 54mOhm, 14x10x5 mm, -55...+105°C" "CAP: D8C3.5H12" 97.375,192.575 r90 top value=100u
C21 "Ceramic capacitor, 1μF, X7R, ±10%, 50V, 1206, -55...+125°C" "CAP: 1206" 100.025,192.8 r270 bottom value=1μF
C22 "Film capacitor, 1n, 2kv, ±10%, 10.9mOhm, 31.5x15 mm, -40...+105°C" "CAP: AY2102M29Y5US63L7" 96.525,112.8 r270 top value=1n
C23 "Ceramic capacitor, 2.2n, X7R, ±10%, 50V, 1206, -55...+125°C" "CAP: 1206" 116.45,15.749 r270 bottom value=2.2n
C24 "Ceramic capacitor, 1μF, X7R, ±10%, 50V, 1206, -55...+125°C" "CAP: 1206" 120.175,15.7 r0 top value=1μF
C25 "Ceramic capacitor, 0.1μF, X7R, ±10%, 50V, 1206, -55...+125°C" "CAP: 1206" 120.45,15.475 r180 bottom value=0.1μF
C26 "Ceramic capacitor, 100μF, X7R, ±10%, 50V, 1206, -55...+125°C" "CAP: 1206" 120.175,18.275 r180 top value=100μF
C27 "Ceramic capacitor, 0.1μF, X7R, ±10%, 50V, 1206, -55...+125°C" "CAP: 1206" 125.35,15.425 r0 bottom value=0.1μF
C28 "Ceramic capacitor, 1n, X7R, ±10%, 50V, 1206, -55...+125°C" "CAP: 1206" 136.55,21.375 r180 bottom value=1n
C29 "Ceramic capacitor, 0.1μF, X7R, ±10%, 50V, 1206, -55...+125°C" "CAP: 1206" 119.877,21.95 r0 bottom value=0.1μF
C30 "Ceramic capacitor, 1μF, X7R, ±10%, 50V, 1206, -55...+125°C" "CAP: 1206" 119.845,19.449 r0 bottom value=1μF
C31 "Ceramic capacitor, 1μF, X7R, ±10%, 50V, 1206, -55...+125°C" "CAP: 1206" 119.675,24.225 r0 top value=1μF
C32 "Ceramic capacitor, 2.2μF, X7R, ±10%, 50V, 1206, -55...+125°C" "CAP: 1206" 136.525,26.376 r0 bottom value=2.2μF
C33 "Ceramic capacitor, 0.1μF, X7R, ±10%, 50V, 1206, -55...+125°C" "CAP: 1206" 124.175,30.925 r90 top value=0.1μF
C34 "Ceramic capacitor, 0.1μF, X7R, ±10%, 50V, 1206, -55...+125°C" "CAP: 1206" 126.3,21.9 r90 bottom value=0.1μF
C35 "Ceramic capacitor, 100μF, X7R, ±10%, 50V, 1206, -55...+125°C" "CAP: 1206" 128.8,21.95 r90 bottom value=100μF
C36 "Ceramic capacitor, 0.1μF, X7R, ±10%, 50V, 1206, -55...+125°C" "CAP: 1206" 119.725,29.226 r0 top value=0.1μF
C37 "Ceramic capacitor, 0.1μF, X7R, ±10%, 50V, 1206, -55...+125°C" "CAP: 1206" 129.176,30.925 r90 top value=0.1μF
C38 "Ceramic capacitor, 1n, X7R, ±10%, 50V, 1206, -55...+125°C" "CAP: 1206" 119.7,31.726 r180 top value=1n
C39 "Ceramic capacitor, 10n, X7R, ±10%, 50V, 1206, -55...+125°C" "CAP: 1206" 133.65,29.028 r0 bottom value=10n
C40 "Film capacitor, 1n, 450VDC, ±10%, 10.9mOhm, 31.5x15 mm, -40...+105°C" "CAP: AY2102M29Y5US63L7" 111.352,13.128 r90 top value=1n
C41 "Film capacitor, 10n, 450VDC, ±10%, 10.9mOhm, 31.5x15 mm, -40...+105°C" "CAP: AY2102M29Y5US63L7" 80.65,66.775 r0 top value=10n
C42 "Aluminium capacitor, 100μF, 10v, ±20%, 54mOhm, 14x10x5 mm, -55...+105°C" "CAP: D8C3.5H12" 76.45,90.1 r180 top value=100μF
C43 "Aluminium capacitor, 100μF, 50v, ±20%, 54mOhm, 14x10x5 mm, -55...+105°C" "CAP: D8C3.5H12" 75.725,50.325 r180 top value=100μF
C44 "Ceramic capacitor, 2.2n, X7R, ±10%, 50V, 1206, -55...+125°C" "CAP: 1206" 65.825,68.475 r180 top value=2.2n
C45 "Ceramic capacitor, 100n, X7R, ±10%, 50V, 1206, -55...+125°C" "CAP: 1206" 55.45,81.4 r0 top value=100n
C46 "Ceramic capacitor, 220n, X7R, ±10%, 50V, 1206, -55...+125°C" "CAP: 1206" 75.675,47.625 r0 bottom value=220n
C47 "Ceramic capacitor, 1n, X7R, ±10%, 50V, 1206, -55...+125°C" "CAP: 1206" 63.9,56.075 r90 bottom value=1n
C48 "Film capacitor, 0.47, 310V, ±10%, 10.9mOhm, 31.5x15 mm, -40...+105°C" "CAP: B32922 (18x7x12.5mm)" 39.125,35.75 r90 top value=0.47
C49 "Film capacitor, 0.47, 310V, ±10%, 10.9mOhm, 31.5x15 mm, -40...+105°C" "CAP: B32922 (18x7x12.5mm)" 62.925,41.225 r180 top value=0.47
C50 "Aluminium capacitor, 330μF, 450V, ±20%, 54mOhm, 14x10x5 mm, -55...+105°C" "CAP: D25C10H50" 43.425,69.475 r180 top locked value=330μF
C51 "Film capacitor, 2.2n 1kv, 450VDC, ±10%, 10.9mOhm, 31.5x15 mm, -40...+105°C" "CAP: AY2102M29Y5US63L7" 27.275,73.525 r270 top value="2.2n 1kv"
C52 "Ceramic capacitor, 0.1μF, X7R, ±10%, 50V, 1206, -55...+125°C" "CAP: 1206" 42.45,153.3 r180 bottom value=0.1μF
C53 "Ceramic capacitor, 0.1μF, X7R, ±10%, 50V, 1206, -55...+125°C" "CAP: 1206" 40.95,126.05 r90 bottom value=0.1μF
C54 "Aluminium capacitor, 470μF, 25V, ±20%, 54mOhm, 14x10x5 mm, -55...+105°C" "CAP: D8C3.5H12" 18.15,131.25 r180 top value=470μF
C55 "Aluminium capacitor, 470μF, 25V, ±20%, 54mOhm, 14x10x5 mm, -55...+105°C" "CAP: D8C3.5H12" 18.275,139.845 r180 top value=470μF
C56 "Ceramic capacitor, 100n, X7R, ±10%, 50V, 1206, -55...+125°C" "CAP: 1206" 43.45,126 r90 bottom value=100n
C57 "Ceramic capacitor, 100μF, X7R, ±10%, 50V, 1206, -55...+125°C" "CAP: 1206" 45.126,111.925 r180 bottom value=100μF
C58 "Ceramic capacitor, 100μF, X7R, ±10%, 50V, 1206, -55...+125°C" "CAP: 1206" 40.226,111.925 r0 bottom value=100μF
C59 "Ceramic capacitor, 100μF, X7R, ±10%, 50V, 1206, -55...+125°C" "CAP: 1206" 36.525,110.75 r270 bottom value=100μF
C60 "Ceramic capacitor, 100n, X7R, ±10%, 50V, 1206, -55...+125°C" "CAP: 1206" 34.025,110.75 r270 bottom value=100n
C61 "Ceramic capacitor, 0.1μF, X7R, ±10%, 50V, 1206, -55...+125°C" "CAP: 1206" 83.275,110.325 r180 bottom value=0.1μF
C62 "Ceramic capacitor, 0.1μF, X7R, ±10%, 50V, 1206, -55...+125°C" "CAP: 1206" 69.6,104.8 r90 bottom value=0.1μF
C63 "Ceramic capacitor, 100n, X7R, ±10%, 50V, 1206, -55...+125°C" "CAP: 1206" 37.75,97.175 r90 bottom value=100n
C64 "Ceramic capacitor, 100μF, X7R, ±10%, 50V, 1206, -55...+125°C" "CAP: 1206" 40.25,97.175 r90 bottom value=100μF
C65 "Ceramic capacitor, 100μF, X7R, ±10%, 50V, 1206, -55...+125°C" "CAP: 1206" 42.751,97.175 r90 bottom value=100μF
C66 "Ceramic capacitor, 100μF, X7R, ±10%, 50V, 1206, -55...+125°C" "CAP: 1206" 46.55,97.175 r90 bottom value=100μF
C67 "Ceramic capacitor, 100n, X7R, ±10%, 50V, 1206, -55...+125°C" "CAP: 1206" 49.05,97.175 r90 bottom value=100n
C68 "Aluminium capacitor, 470μF, 25V, ±20%, 54mOhm, 14x10x5 mm, -55...+105°C" "CAP: D8C3.5H12" 83.45,107.95 r0 top value=470μF
C69 "Aluminium capacitor, 470μF, 25V, ±20%, 54mOhm, 14x10x5 mm, -55...+105°C" "CAP: D8C3.5H12" 83.425,98.973 r0 top value=470μF
C70 "Ceramic capacitor, 0.1μF, X7R, ±10%, 50V, 1206, -55...+125°C" "CAP: 1206" 56.675,137.25 r90 bottom value=0.1μF
C71 "Ceramic capacitor, 0.1μF, X7R, ±10%, 50V, 1206, -55...+125°C" "CAP: 1206" 69.176,137.25 r90 bottom value=0.1μF
C72 "Ceramic capacitor, 100n, X7R, ±10%, 50V, 1206, -55...+125°C" "CAP: 1206" 61.676,137.25 r90 bottom value=100n
C73 "Ceramic capacitor, 100μF, X7R, ±10%, 50V, 1206, -55...+125°C" "CAP: 1206" 64.176,137.25 r90 bottom value=100μF
C74 "Ceramic capacitor, 100μF, X7R, ±10%, 50V, 1206, -55...+125°C" "CAP: 1206" 60.025,157.225 r270 bottom value=100μF
C75 "Ceramic capacitor, 100μF, X7R, ±10%, 50V, 1206, -55...+125°C" "CAP: 1206" 57.525,157.175 r270 bottom value=100μF
C76 "Ceramic capacitor, 100n, X7R, ±10%, 50V, 1206, -55...+125°C" "CAP: 1206" 59.175,137.25 r90 bottom value=100n
C77 "Aluminium capacitor, 470μF, 25V, ±20%, 54mOhm, 14x10x5 mm, -55...+105°C" "CAP: D8C3.5H12" 85.825,145.55 r0 top value=470μF
C78 "Aluminium capacitor, 470μF, 25V, ±20%, 54mOhm, 14x10x5 mm, -55...+105°C" "CAP: D8C3.5H12" 85.125,154.225 r0 top value=470μF
C79 "Ceramic capacitor, 0.1μF, X7R, ±10%, 50V, 1206, -55...+125°C" "CAP: 1206" 6.325,189.15 r180 bottom value=0.1μF
C80 "Ceramic capacitor, 0.1μF, X7R, ±10%, 50V, 1206, -55...+125°C" "CAP: 1206" 5.025,165.7 r180 bottom value=0.1μF
C81 "Ceramic capacitor, 0.1μF, X7R, ±10%, 50V, 1206, -55...+125°C" "CAP: 1206" 16.1,155.1 r270 bottom value=0.1μF
C82 "Ceramic capacitor, 0.1μF, X7R, ±10%, 50V, 1206, -55...+125°C" "CAP: 1206" 13.575,159.275 r270 bottom value=0.1μF
C83 "Ceramic capacitor, 100n, X7R, ±10%, 50V, 1206, -55...+125°C" "CAP: 1206" 19.725,53.025 r270 bottom value=100n
C84 "Aluminium capacitor, 100μF, 25v, ±20%, 54mOhm, 14x10x5 mm, -55...+105°C" "CAP: D8C3.5H12" 13.775,56.075 r90 top value=100μF
C85 "Ceramic capacitor, 100n, X7R, ±10%, 50V, 1206, -55...+125°C" "CAP: 1206" 65.525,176.65 r180 bottom value=100n
C86 "Ceramic capacitor, 100n, X7R, ±10%, 50V, 1206, -55...+125°C" "CAP: 1206" 19.875,158.802 r0 bottom value=100n
C87 "Ceramic capacitor, 4.7u, X7R, ±10%, 50V, 1206, -55...+125°C" "CAP: 1206" 57.95,192.85 r0 top value=4.7u
C88 "Ceramic capacitor, 2.2n, X7R, ±10%, 50V, 1206, -55...+125°C" "CAP: 1206" 71.975,68.5 r180 top value=2.2n
C89 "Ceramic capacitor, 470p, X7R, ±10%, 50V, 1206, -55...+125°C" "CAP: 1206" 72,66 r180 top value=470p
C90 "Film capacitor, 2.2n, 450VDC, ±10%, 10.9mOhm, 31.5x15 mm, -40...+105°C" "CAP: AY2102M29Y5US63L7" 110.675,74.025 r0 top value=2.2n
C91 "Ceramic capacitor, 100n, X7R, ±10%, 50V, 1206, -55...+125°C" "CAP: 1206" 18.744,155.102 r90 bottom value=100n
C92 "Film capacitor, 2.2n, 450VDC, ±10%, 10.9mOhm, 31.5x15 mm, -40...+105°C" "CAP: AY2102M29Y5US63L7" 99.825,5.125 r180 top value=2.2n
C93 "Film capacitor, 15p, 2kV, ±10%, 10.9mOhm, 31.5x15 mm, -40...+105°C" "CAP: AY2102M29Y5US63L7" 134.325,41.55 r90 top value=15p
C94 "Ceramic capacitor, 100n, X7R, ±10%, 50V, 1206, -55...+125°C" "CAP: 1206" 39.95,157.073 r90 bottom value=100n
C95 "Ceramic capacitor, 100n, X7R, ±10%, 50V, 1206, -55...+125°C" "CAP: 1206" 37.45,157.047 r90 bottom value=100n
C96 "Ceramic capacitor, 100n, X7R, ±10%, 50V, 1206, -55...+125°C" "CAP: 1206" 12.65,191.325 r270 top value=100n
C97 "Ceramic capacitor, 100n, X7R, ±10%, 50V, 1206, -55...+125°C" "CAP: 1206" 8.525,191.325 r90 top value=100n
C98 "Ceramic capacitor, 100n, X7R, ±10%, 50V, 1206, -55...+125°C" "CAP: 1206" 10.5,185 r270 bottom value=100n
C99 "Ceramic capacitor, 100n, X7R, ±10%, 50V, 1206, -55...+125°C" "CAP: 1206" 8,185 r90 bottom value=100n
C100 "Ceramic capacitor, 100n, X7R, ±10%, 50V, 1206, -55...+125°C" "CAP: 1206" 94.925,169.255 r270 bottom value=100n
C101 "Ceramic capacitor, 100n, X7R, ±10%, 50V, 1206, -55...+125°C" "CAP: 1206" 97.425,169.25 r90 bottom value=100n
CPU "DS1011-20RBSIB7" DS101120RBSIB7 40.22,185.875 r0 bottom locked
D1 "ES1JTR" DIOM5226X295N 14.25,42.525 r180 bottom
D2 "ES1JTR" DIOM5226X295N 104.1,179.45 r90 bottom
D3 "UF4007" THT_D_6mm_1#1 101.225,92.7 r90 top
D4 "ES1JTR" DIOM5226X295N 104.025,188.8 r270 bottom
D5 "ES1JTR" DIOM5226X295N 74.825,29.25 r270 bottom
D6 "ES1JTR" DIOM5226X295N 76.95,18.4 r0 bottom
D7 "ES1JTR" DIOM5226X295N 78.6,25.175 r270 bottom
D8 "ES1JTR" DIOM5226X295N 76.225,34.75 r0 bottom
D9 "RHRP8120" TO508P467X1023X1923-2P 134.75,71.18 r270 top
D10 "UF4007" THT_D_6mm_1#1 98.275,66.875 r180 top
D11 "1N4148W-V-GS08" 1N4148WVGS08 97.5,49.75 r0 bottom
D12 "1N4148W-V-GS08" 1N4148WVGS08 86.725,56.375 r0 bottom
D13 "1N4007" THT_D_6mm_1#1 31.95,33.475 r270 top
D14 "1N4148W-V-GS08" 1N4148WVGS08 61.325,56.3 r90 bottom
D15 "BZV55B3V3" BZV55B3V3 76.425,71.225 r90 top
D16 "1N4148W-V-GS08" 1N4148WVGS08 15.025,191.1 r90 bottom
D17 "1.5KE24A" THT_D_6mm_1#2 8.55,156.9 r180 top
D18 "1N4148W-V-GS08" 1N4148WVGS08 15.2,185.25 r90 bottom
D19 "1N4148W-V-GS08" 1N4148WVGS08 19.525,163.625 r180 bottom
D20 "1N4148W-V-GS08" 1N4148WVGS08 38.675,163.5 r180 bottom
D21 "1N4148W-V-GS08" 1N4148WVGS08 77.7,163.375 r180 bottom
D22 "1.5KE24A" THT_D_6mm_1#2 10.675,179.4 r180 top
D23 "1.5KE24A" THT_D_6mm_1#2 9.425,128.475 r180 top
D24 "1.5KE24A" THT_D_6mm_1#2 8.475,151.325 r180 top
Eth1 "Power connector, *, *" "CON: TH 3.5mm" 47.125,4.75 r0 top
FL1 "UU10.5Y-10MH" UU105Y10MH 55.425,21.35 r0 top locked
fod3184_+18v "Power connector, *, *" "CON: TH 1mm" 16,108.8 r90 top
FU1 "Electromechanics relay, 250VAC, 3A, 5x20mm," "FUSE: FC-001S" 35.85,17.65 r0 top
FU2 "Electromechanics relay, 250VAC, 3A, 5x20mm," "FUSE: FC-001S" 24.45,34.575 r90 top
gnd_bridge "Power connector, *, *" "CON: TH 3.5mm" 92.65,138.725 r90 top
IC1 "FOD3184SDV" SOP254P1030X508-8N 86.15,180.525 r0 bottom
IC2 "FOD3184SDV" SOP254P1030X508-8N 86.15,190.65 r0 bottom
IC3 "SG3525A" SOIC127P1030X265-16N 128.525,21.675 r180 top
IC4 "UCC27524A1QDGNRQ1" SOP65P490X110-9N 118.775,21.349 r180 top
IC5 "LM2903DR" SOIC127P600X175-8N 125.775,30.25 r0 bottom
IC6 "LTV817S" SOP254P1016X460-4N 65.9,76.875 r270 top
IC7 "TL431MFDT,215" SOT95P230X110-3N 60.6,86.6 r90 top
IC8 "L6565D" SOIC127P600X175-8N 75.875,54.45 r0 bottom
IC9 "LTV817S" SOP254P1016X460-4N 53.611,170.125 r90 bottom
IC10 "LTV817S" SOP254P1016X460-4N 95.425,38.75 r0 top
IC11 "LTV817S" SOP254P1016X460-4N 38.775,170.275 r90 bottom
IC12 "LTV817S" SOP254P1016X460-4N 43.765,170.175 r270 bottom
IC13 "LTV817S" SOP254P1016X460-4N 19.75,170.375 r90 bottom
IC14 "LM317_SOT-223_" SOT230P700X180-4N 41.575,117.65 r90 bottom
IC15 "LM317_SOT-223_" SOT230P700X180-4N 43.15,104 r180 bottom
IC16 "LTV817S" SOP254P1016X460-4N 77.5,169.775 r90 bottom
IC17 "LTV817S" SOP254P1016X460-4N 48.711,170.1 r270 bottom
IC18 "LTV817S" SOP254P1016X460-4N 21.75,191.05 r0 bottom
IC19 "LM317_SOT-223_" SOT230P700X180-4N 64.125,147 r90 bottom
IC20 "LTV817S" SOP254P1016X460-4N 58.601,170.075 r270 bottom
IC21 "LTV817S" SOP254P1016X460-4N 21.75,185.3 r0 bottom
IC22 "LTV817S" SOP254P1016X460-4N 14.85,170.35 r270 bottom
IC23 "LTV817S" SOP254P1016X460-4N 72.1,76.875 r270 top
IC24 "LTV817S" SOP254P1016X460-4N 55.7,76.8 r90 bottom
K1 "HF118F_012" HF118F0051ZS1T136 18.425,49.05 r270 top
on-off1 "15EDGRC-3.81-04P-14-00A_H_" SHDRRA4W80P0X381_1X4_1603X920X754P 8.575,162.115 r90 top
PS1 "IRM-15-24" IRM-15-5 24.425,95.275 r0 top locked
PS2 "IRM-15-24" IRM-15-5 24.425,123.2 r0 top locked
PS3 "IRM-10-3.3" IRM1033 29.075,158.9 r0 top locked
Q1 "BSC123N08NS3GATMA1" PG-TDSON-8 107.375,9.475 r270 bottom
Q2 "BSC123N08NS3GATMA1" PG-TDSON-8 107.775,35.25 r270 bottom
Q3 "BC817-25,215" BC81725215 119.75,27.8 r90 bottom
Q4 "AO3407" SOT95P280X125-3N 45.325,159.225 r90 bottom
Q5 "AO3407" SOT95P280X125-3N 40.575,148.425 r0 bottom
Q7 "BC817-25,215" BC81725215 41.7,138.8 r90 bottom
Q9 "AO3407" SOT95P280X125-3N 53.3,101.65 r270 bottom
Q10 "AO3407" SOT95P280X125-3N 65.925,107.375 r0 bottom
Q12 "BC817-25,215" BC81725215 68.3,97.2 r0 bottom
Q14 "AO3407" SOT95P280X125-3N 58.25,145.825 r270 bottom
Q15 "AO3407" SOT95P280X125-3N 77.5,151.875 r90 bottom
Q16 "BC817-25,215" BC81725215 76.85,141.05 r0 bottom
Q18 "BC817-25,215" BC81725215 10.85,55.525 r0 bottom
Q19 "BC817-25,215" BC81725215 52.6,195.925 r180 top
Q20 "BC817-25,215" BC81725215 47.3,196.025 r90 top
R1 "Resistor film, 15, ±5%, 2512, 1W, -55...+125°C" "RES: 2512" 97.725,173.725 r180 bottom value=15
R2 "Resistor film, 1k, ±5%, 1206, 0.25W, -55...+125°C" "RES: 1206" 79.1,180.4 r270 bottom value=1k
R3 "Resistor film, 1k, ±5%, 2512, 1W, -55...+125°C" "RES: 2512" 112.05,153.95 r90 bottom value=1k
R4 "47" THT_R_6mm_1 95.925,98.425 r270 top
R5 "Resistor film, 15, ±5%, 2512, 1W, -55...+125°C" "RES: 2512" 97.7,186.225 r180 bottom value=15
R6 "Resistor film, 1k, ±5%, 1206, 0.25W, -55...+125°C" "RES: 1206" 78.35,190.675 r270 bottom value=1k
R7 "Resistor film, 1k, ±5%, 2512, 1W, -55...+125°C" "RES: 2512" 90.8,109.125 r270 bottom value=1k
R8 "Resistor film, 10k, ±5%, 1206, 0.25W, -55...+125°C" "RES: 1206" 116.475,17.175 r270 top value=10k
R9 "Resistor film, 10, ±5%, 1206, 0.25W, -55...+125°C" "RES: 1206" 110.525,17 r270 bottom value=10
R10 "Resistor film, 10k, ±5%, 1206, 0.25W, -55...+125°C" "RES: 1206" 128.825,18.05 r0 bottom value=10k
R11 "Resistor film, 10k, ±5%, 1206, 0.25W, -55...+125°C" "RES: 1206" 117.575,7.45 r180 bottom value=10k
R12 "Resistor film, 10, ±5%, 1206, 0.25W, -55...+125°C" "RES: 1206" 116.075,27.174 r90 bottom value=10
R13 "0.02" RES_BPR58-STRAIGHT_KOA 119.175,10.5 r0 top
R14 "Resistor film, 10, ±5%, 1206, 0.25W, -55...+125°C" "RES: 1206" 123.775,20.225 r270 bottom value=10
R15 "Resistor film, 47, ±5%, 1206, 0.25W, -55...+125°C" "RES: 1206" 131.301,21.923 r270 bottom value=47
R16 "Resistor film, 10k, ±5%, 1206, 0.25W, -55...+125°C" "RES: 1206" 127.539,25.65 r0 bottom value=10k
R17 "Resistor film, 6.8k, ±5%, 1206, 0.25W, -55...+125°C" "RES: 1206" 136.475,23.875 r180 bottom value=6.8k
R18 "Resistor film, 10k, ±5%, 1206, 0.25W, -55...+125°C" "RES: 1206" 118.825,30.875 r180 bottom value=10k
R19 "Resistor film, 22k, ±5%, 1206, 0.25W, -55...+125°C" "RES: 1206" 119.7,26.725 r180 top value=22k
R20 "Resistor film, 30k, ±5%, 1206, 0.25W, -55...+125°C" "RES: 1206" 118.875,33.4 r180 bottom value=30k
R21 "Resistor film, 100, ±5%, 1206, 0.25W, -55...+125°C" "RES: 1206" 119.825,24.45 r0 bottom value=100
R22 "Resistor film, 10k, ±5%, 1206, 0.25W, -55...+125°C" "RES: 1206" 131.146,32.729 r270 bottom value=10k
R23 "Resistor film, 1k, ±5%, 1206, 0.25W, -55...+125°C" "RES: 1206" 126.675,30.925 r270 top value=1k
R24 "Resistor film, 10k, ±5%, 1206, 0.25W, -55...+125°C" "RES: 1206" 127.311,34.625 r0 top value=10k
R25 "10" THT_R_6mm_1 112.025,29.775 r270 top
R26 "100k" THT_R_6mm_1 92.025,73.05 r180 top
R27 "Resistor film, 75k, 2512, 2512, 1W, -55...+125°C" "RES: 2512" 77.325,43.875 r0 bottom value=75k
R28 "Resistor film, 75k, 2512, 2512, 1W, -55...+125°C" "RES: 2512" 83.825,45.1 r90 bottom value=75k
R29 "Resistor film, 47k, ±5%, 1206, 0.25W, -55...+125°C" "RES: 1206" 80.625,59.575 r0 bottom value=47k
R30 "Resistor film, 1.2k, ±5%, 1206, 0.25W, -55...+125°C" "RES: 1206" 68.65,87.6 r180 top value=1.2k
R31 "Resistor film, 47, ±5%, 1206, 0.25W, -55...+125°C" "RES: 1206" 90.175,45.875 r0 bottom value=47
R32 "Resistor film, 1k, ±5%, 1206, 0.25W, -55...+125°C" "RES: 1206" 65.65,84.95 r0 top value=1k
R33 "Resistor film, 150k, 2512, 2512, 1W, -55...+125°C" "RES: 2512" 112.65,80.5 r0 bottom value=150k
R34 "Resistor film, 220k, ±5%, 1206, 0.25W, -55...+125°C" "RES: 1206" 60.575,81.4 r0 top value=220k
R35 "Resistor film, 100R, ±5%, 1206, 0.25W, -55...+125°C" "RES: 1206" 82.325,54.575 r90 bottom value=100R
R36 "Resistor film, 150k, 2512, 2512, 1W, -55...+125°C" "RES: 2512" 102.625,86.325 r0 bottom value=150k
R37 "Resistor film, 3M, ±5%, 1206, 0.25W, -55...+125°C" "RES: 1206" 69.75,56 r270 bottom value=3M
R38 "Resistor film, 10, ±5%, 1206, 0.25W, -55...+125°C" "RES: 1206" 86.6,53.55 r0 bottom value=10
R39 "Resistor film, 10k, ±5%, 1206, 0.25W, -55...+125°C" "RES: 1206" 90.125,50.925 r180 bottom value=10k
R40 "Resistor film, 16k, ±5%, 1206, 0.25W, -55...+125°C" "RES: 1206" 66.8,56 r270 bottom value=16k
R41 "Resistor film, 2.43k, 2512, 2512, 1W, -55...+125°C" "RES: 2512" 53.925,88.225 r270 top value=2.43k
R42 "BPR58CR10J - 2 Om" BPR58CR10J 96.95,50.5 r90 top
R43 "33k" THT_R_6mm_1 39.725,24.05 r180 top
R44 "Resistor film, 1k, ±5%, 1206, 0.25W, -55...+125°C" "RES: 1206" 111.85,40.075 r0 top value=1k
R45 "33k" THT_R_6mm_1 31.95,43.025 r270 top
R46 "NTC resistor, NTC 10, ±20%, pitch 7.5mm, 7A, -55...+125°C" "RES: B57237 (NTC)" 69.4,32.075 r180 top value="NTC 10"
R47 "Resistor film, 100k, ±5%, 1206, 0.25W, -55...+125°C" "RES: 1206" 46.7,152.575 r90 bottom value=100k
R48 "Resistor film, 470, ±5%, 1206, 0.25W, -55...+125°C" "RES: 1206" 42.45,157.099 r270 bottom value=470
R49 "Resistor film, 10k, ±5%, 1206, 0.25W, -55...+125°C" "RES: 1206" 39.075,133.85 r180 bottom value=10k
R50 "Resistor film, 100k, ±5%, 1206, 0.25W, -55...+125°C" "RES: 1206" 36.5,148.625 r90 bottom value=100k
R51 "Resistor film, 2k, ±5%, 1206, 0.25W, -55...+125°C" "RES: 1206" 40.775,144 r180 bottom value=2k
R52 "Resistor film, 1k, ±5%, 1206, 0.25W, -55...+125°C" "RES: 1206" 44.625,162.55 r0 bottom value=1k
R53 "Resistor film, 10k, ±5%, 1206, 0.25W, -55...+125°C" "RES: 1206" 38.95,161.2 r0 bottom value=10k
R54 "Resistor film, 10k, ±5%, 1206, 0.25W, -55...+125°C" "RES: 1206" 37.175,138.8 r270 bottom value=10k
R55 "Resistor film, 620, ±5%, 1206, 0.25W, -55...+125°C" "RES: 1206" 34.95,156.996 r90 bottom value=620
R56 "Resistor film, 470, ±5%, 1206, 0.25W, -55...+125°C" "RES: 1206" 21.282,155.102 r270 bottom value=470
R57 "Resistor film, 3.3k, ±5%, 1206, 0.25W, -55...+125°C" "RES: 1206" 48.95,113.1 r90 bottom value=3.3k
R58 "Resistor film, 240, ±5%, 1206, 0.25W, -55...+125°C" "RES: 1206" 47.425,118.975 r90 bottom value=240
R59 "Resistor film, 620, ±5%, 1206, 0.25W, -55...+125°C" "RES: 1206" 16.152,160 r90 bottom value=620
R60 "Resistor film, 10k, ±5%, 1206, 0.25W, -55...+125°C" "RES: 1206" 19.875,161.333 r0 bottom value=10k
R61 "Resistor film, 3.3k, ±5%, 1206, 0.25W, -55...+125°C" "RES: 1206" 49.175,104.675 r90 bottom value=3.3k
R62 "Resistor film, 240, ±5%, 1206, 0.25W, -55...+125°C" "RES: 1206" 42.95,108.975 r180 bottom value=240
R63 "Resistor film, 470, ±5%, 1206, 0.25W, -55...+125°C" "RES: 1206" 79.075,159.95 r270 bottom value=470
R64 "Resistor film, 620, ±5%, 1206, 0.25W, -55...+125°C" "RES: 1206" 89.925,169.25 r90 bottom value=620
R65 "Resistor film, 100k, ±5%, 1206, 0.25W, -55...+125°C" "RES: 1206" 53.65,108.55 r180 bottom value=100k
R66 "Resistor film, 10k, ±5%, 1206, 0.25W, -55...+125°C" "RES: 1206" 65.075,100.775 r180 bottom value=10k
R67 "Resistor film, 10k, ±5%, 1206, 0.25W, -55...+125°C" "RES: 1206" 92.425,169.25 r270 bottom value=10k
R68 "Resistor film, 100k, ±5%, 1206, 0.25W, -55...+125°C" "RES: 1206" 57.7,106.85 r90 bottom value=100k
R69 "Resistor film, 2k, ±5%, 1206, 0.25W, -55...+125°C" "RES: 1206" 63.125,96.6 r180 bottom value=2k
R70 "Resistor film, 10k, ±5%, 1206, 0.25W, -55...+125°C" "RES: 1206" 53.6,111.05 r180 bottom value=10k
R71 "Resistor film, 10k, ±5%, 1206, 0.25W, -55...+125°C" "RES: 1206" 70.9,100.85 r180 bottom value=10k
R72 "Resistor film, 470, ±5%, 1206, 0.25W, -55...+125°C" "RES: 1206" 11.275,189.1 r180 bottom value=470
R73 "Resistor film, 3.3k, ±5%, 1206, 0.25W, -55...+125°C" "RES: 1206" 66.676,137.25 r90 bottom value=3.3k
R74 "Resistor film, 240, ±5%, 1206, 0.25W, -55...+125°C" "RES: 1206" 65.55,142.225 r180 bottom value=240
R75 "Resistor film, 10k, ±5%, 1206, 0.25W, -55...+125°C" "RES: 1206" 15.15,191.325 r270 top value=10k
R76 "Resistor film, 620, ±5%, 1206, 0.25W, -55...+125°C" "RES: 1206" 6.25,192.175 r0 bottom value=620
R77 "Resistor film, 100k, ±5%, 1206, 0.25W, -55...+125°C" "RES: 1206" 57.65,152.575 r180 bottom value=100k
R78 "Resistor film, 10k, ±5%, 1206, 0.25W, -55...+125°C" "RES: 1206" 77.075,137.45 r180 bottom value=10k
R79 "Resistor film, 100k, ±5%, 1206, 0.25W, -55...+125°C" "RES: 1206" 78.225,147.875 r180 bottom value=100k
R80 "Resistor film, 2k, ±5%, 1206, 0.25W, -55...+125°C" "RES: 1206" 78.225,145.1 r0 bottom value=2k
R81 "Resistor film, 10k, ±5%, 1206, 0.25W, -55...+125°C" "RES: 1206" 55.024,157.15 r270 bottom value=10k
R82 "Resistor film, 470, ±5%, 1206, 0.25W, -55...+125°C" "RES: 1206" 15.2,179.925 r180 bottom value=470
R83 "Resistor film, 10k, ±5%, 1206, 0.25W, -55...+125°C" "RES: 1206" 73.1,145.925 r90 bottom value=10k
R84 "Resistor film, 10k, ±5%, 1206, 0.25W, -55...+125°C" "RES: 1206" 13.025,185 r270 bottom value=10k
R85 "Resistor film, 620, ±5%, 1206, 0.25W, -55...+125°C" "RES: 1206" 5.475,185 r90 bottom value=620
R86 "Resistor film, 1k, ±5%, 1206, 0.25W, -55...+125°C" "RES: 1206" 18.1,72.85 r0 bottom value=1k
R87 "Resistor film, 10k, ±5%, 1206, 0.25W, -55...+125°C" "RES: 1206" 11.425,59.9 r180 bottom value=10k
R88 "Resistor film, 4.7k, ±5%, 1206, 0.25W, -55...+125°C" "RES: 1206" 57.95,195.4 r0 top value=4.7k
R89 "Resistor film, 1.2k, ±5%, 1206, 0.25W, -55...+125°C" "RES: 1206" 77.5,81.45 r180 top value=1.2k
R90 "Resistor film, 4.7k, ±5%, 1206, 0.25W, -55...+125°C" "RES: 1206" 79.25,71.25 r270 top value=4.7k
R91 "Resistor film, 1k, ±5%, 1206, 0.25W, -55...+125°C" "RES: 1206" 90.125,48.425 r0 bottom value=1k
R92 "Resistor film, 10k, ±5%, 1206, 0.25W, -55...+125°C" "RES: 1206" 63,195.45 r180 top value=10k
R93 "Resistor film, 10k, ±5%, 1206, 0.25W, -55...+125°C" "RES: 1206" 47.725,192.9 r180 top value=10k
R94 "Resistor film, 10k, ±5%, 1206, 0.25W, -55...+125°C" "RES: 1206" 43.925,194.125 r270 top value=10k
R95 "Resistor film, 100k, ±5%, 1206, 0.25W, -55...+125°C" "RES: 1206" 52.825,192.9 r180 top value=100k
R96 "1k" THT_R_6mm_1 134.975,54.15 r90 top
R97 "Resistor film, 1k, ±5%, 1206, 0.25W, -55...+125°C" "RES: 1206" 50.325,84.95 r180 bottom value=1k
R98 "Resistor film, 10k, ±5%, 1206, 0.25W, -55...+125°C" "RES: 1206" 51.725,162.6 r180 bottom value=10k
rele220_out "15EDGRC-3.5-02P-13-00AH" 15EDGRC3502P1300AH 8.175,71.825 r90 top
RV1 "MOV-20D431K" MOV20D431K 48.225,34.125 r270 top
switch_vak1 "15EDGRC-3.81-04P-14-00A_H_" SHDRRA4W80P0X381_1X4_1603X920X754P 8.45,134.315 r90 top
T1 "E25" E25 105.725,32.245 r180 top locked
T2 "E25" E25 105.805,46.422 r0 top locked
VD1 "Single diode, 75V, 150mA, 1V, 4ns, SOD-323, -55...+150°C" TO247(D) 93.175,153.9 r90 top
VD2 "Single phase rectifier, 600V, 2A, 1.1V, 4-SMD, -55...+150°C" "DIODE: KBU6M" 44.425,51.175 r0 top
VT1 "IGBT transistor, 650V, 40A, 40nC, 144W, 2.1V, 22ns/73ns, TO247, -55...+125°C" TO247 98.875,153.95 r270 top
VT2 "IGBT transistor, 650V, 40A, 40nC, 144W, 2.1V, 22ns/73ns, TO247, -55...+125°C" TO247 101.275,109.95 r90 top
VT3 "MOSFET N-channel transistor, 80V, 7A, 9.1nC, 2.5W, 34mOhm, 756pF, 8-TDSON, -55...+150°C" TO220 94.225,60.75 r0 top
Z1 "BZV55C16" BZV55C18 90.15,42.9 r0 bottom
Z2 "BZV55C15" DO-213AA 53.375,105.575 r180 bottom
Z3 "BZV55C15" DO-213AA 60.75,106.85 r270 bottom
Z4 "BZV55C15" DO-213AA 58.025,149.5 r180 bottom
Z5 "BZV55C15" DO-213AA 81.475,152.375 r270 bottom
Z6 "BZV55C18" BZV55C18 70.425,145.95 r90 bottom
Z7 "BZV55C18" BZV55C18 64.95,103.4 r180 bottom
Z8 "BZV55C9V1" BZV55C18 39.125,130.95 r180 bottom

## Footprints (in the part's own frame and the unit in brackets; to place one, negate y for a bottom-side part, rotate by r counter-clockwise, add the part's x,y. Pads: shape width x height; smd on the part's side, far side on the other; paste and mask are expansions set on the pad)
1N4148WVGS08 [mm]
  rect 0.85x0.85 smd: 1(-1.675,0) 2(1.675,0)
  silkscreen extent -2.7,-0.77 1.35,0.77, body extent -1.85,-0.77 1.85,0.77, height 1.26
15EDGRC3502P1300AH [mm]
  rect 2.1x2.1 hole 1.4: 1(0,0)
  round 2.1 hole 1.4: 2(-3.5,0)
  silkscreen extent -5.72,-1.75 2.07,8, body extent -5.72,-1.2 2.08,8, height 7.25
BC81725215 [mm]
  rect 0.6x0.7 smd: 1(-0.95,-1) 2(0.95,-1) 3(0,1)
  silkscreen extent -1.45,-1.8 1.45,0.65, body extent -1.45,-1.2 1.45,1.2, height 0.95
BPR58CR10J [mm]
  rect 1.5x1.5 hole 1: 1(-4.575,0.025)
  round 1.5 hole 1: 2(4.2,0.05)
  silkscreen extent -7,-2.5 7,3.1, body extent -7,-2.5 7,2.5, height 18.22
BZV55B3V3 [mm]
  rect 1x1.7 smd: 1(-1.65,0) 2(1.65,0)
  silkscreen extent -2.7,-0.76 0.9,0.76
BZV55C18 [mm]
  rect 1.57x1.96 smd: 1(-1.75,0) 2(1.75,0)
  silkscreen extent -3.1,-0.82 0.6,0.82, body extent -1.75,-0.79 1.75,0.79, height 1.6
"CAP: 1206" [mm]
  rect 1x1.6 smd: 1(-1.5,0) 2(1.5,0)
  silkscreen extent -2.3,-1.1 2.3,1.1, body extent -1.6,-0.8 1.6,0.8, height 1
"CAP: AY2102M29Y5US63L7" [mm]
  round 1.8 hole 0.9: 1(0,0) 2(7.5,-1.5)
  silkscreen extent -0.5,-2.5 8,1, body extent -0.5,-3.3 8.1,1.7, height 10.75
"CAP: B32922 (18x7x12.5mm)" [mm]
  round 2 hole 1 mask+0.075: 1(-7.5,0) 2(7.5,0)
  silkscreen extent -9,-3.5 9,3.5, body extent -9,-3.5 9,3.5, height 12.5
"CAP: D8C3.5H12" [mm]
  oct 1.6x1.6 hole 0.8: 1(-1.75,0)
  round 1.6 hole 0.8: 2(1.75,0)
  silkscreen extent -4,-4 4,4, body extent -4.25,-4.25 4.25,4.25, height 13
"CAP: D25C10H50" [mm]
  round 4 hole 2.1: 1(-5,-1.25) 2(5,1.25)
  silkscreen extent -12.5,-12.5 12.5,12.5, body extent -12.5,-12.5 12.5,12.5, height 50
"CAP: D35C10H40" [mm]
  rrect50% 6x6 hole 3: 1(0,0) 2(10.5,2.5)
  silkscreen extent -12.5,-16.5 22.5,18.5, body extent -13,-17 23,19, height 40
"CON: 15EDGVC-3.5-03 (or 691321100003)" [mm] "Vertical PCB Header, pitch 3.5mm, 03p"
  round 2.1 hole 1.4: 1(-3.5,-0.8) 2(0,-0.8) 3(3.5,-0.8)
  round 0.5 on Top Overlay: ""(-5.2,-2.9)
  silkscreen extent -5.95,-3.6 5.95,3.6, body extent -5.95,-3.6 5.95,3.6, height 9.3
"CON: TH 1mm" [mm]
  round 2 hole 1 mask+0.075: 1(0,0)
  silkscreen extent -1.2,-1.2 1.2,1.2
"CON: TH 3.5mm" [mm]
  round 0.7 hole 0.3: 1(-2.4,0) 1(-2.1,-1.2) 1(-2,1.2) 1(-1.2,2.1) 1(-1.2,-2) 1(0,2.4) 1(0,-2.4) 1(1.2,2) 1(1.2,-2.1) 1(2,-1.2) 1(2.1,1.2) 1(2.4,0)
  round 6 hole 3.5: 1(0,0)
  silkscreen extent -3.2,-3.2 3.2,3.2
"DIODE: KBU6M" [mm]
  oct 3x3 hole 1.3: 1(-7.5,0)
  round 3 hole 1.3: 2(-2.5,0) 3(7.5,0) 4(2.5,0)
  silkscreen extent -12.03,-2.25 12.03,5.15, body extent -11.85,-2.1 11.85,5, height 19.8
DIOM5226X295N [mm]
  rect 2.35x1.6 smd: 1(-2.15,0) 2(2.15,0)
  silkscreen extent -2.95,-1.31 2.62,1.31, body extent -2.62,-1.31 2.62,1.31, height 2.95
DO-213AA [mm]
  rect 1.4x2.03 smd: 1(-1.84,0) 2(1.84,0)
  silkscreen extent -0.8,-0.8 0.8,0.8, body extent -1.86,-0.84 1.86,0.84, height 1.7
DS101120RBSIB7 [mm]
  rect 1.53x1.53 hole 1.02: 1(0,0)
  round 1.53 hole 1.02: 2(0,2.54) 3(2.54,0) 4(2.54,2.54) 5(5.08,0) 6(5.08,2.54) 7(7.62,0) 8(7.62,2.54) 9(10.16,0) 10(10.16,2.54) 11(12.7,0) 12(12.7,2.54) 13(15.24,0) 14(15.24,2.54) 15(17.78,0) 16(17.78,2.54) 17(20.32,0) 18(20.32,2.54) 19(22.86,0) 20(22.86,2.54)
  round 4.05 hole 2.7: MH1(-6.02,1.27) MH2(28.88,1.27)
  silkscreen extent -10.97,-24.84 33.83,3.16, body extent -10.97,-24.84 33.83,3.16, height 8.8
E25 [mm]
  round 2.4 hole 1.2: 1(0,20.32) 2(0,15.24) 3(0,10.16) 4(0,5.08) 5(0,0) 6(20.32,0) 7(20.32,5.08) 8(20.32,10.16) 9(20.32,15.24) 10(20.32,20.32)
  silkscreen extent -3.7,-3.92 24.3,24.08
"FUSE: FC-001S" [mm]
  round 3 hole 1.5: 1(-10.5,0) 1(-5,0) 2(5,0) 2(10.5,0)
  silkscreen extent -12.5,-3.5 12.5,3.5, body extent -10.7,-2.9 10.7,2.8, height 5.5
HF118F0051ZS1T136 [mm]
  rect 1.95x1.95 hole 1.3: 1(0,0)
  round 1.95 hole 1.3: 2(0,-7.62) 3(22.1,-7.62) 4(25.3,0) 5(18.9,0)
  silkscreen extent -1.7,-8.86 26.8,1.24, body extent -1.7,-8.86 26.8,1.24, height 12.9
IRM1033 [mm]
  round 1.86 hole 1.24: 1(0,0) 2(0,10.75) 3(38.5,8) 4(38.5,0)
  silkscreen extent -3.6,-3.45 42.1,21.95, body extent -3.6,-3.45 42.1,21.95, height 21.6
IRM-15-5 [mm]
  round 1.85 hole 1.24: 1(3.4,24) 2(3.4,3.2) 3(48.4,3.2) 4(48.4,11.2)
  silkscreen extent 0,0 52.4,28.75, body extent 0.2,-0.1 52.6,27.1, height 25.86
MOV20D431K [mm]
  round 2.64 hole 1.76: 1(-5,0) 2(5,0)
  silkscreen extent -11.5,-2.8 11.5,2.8, body extent -11.5,-2.8 11.5,2.8, height 26.1
PG-TDSON-8 [mm]
  rect 0.65x1.2 smd: 1(-1.905,-6) 2(-0.635,-6) 3(0.635,-6) 4(1.905,-6)
  rect 0.7x0.5 smd: 5(2,0) 6(0.665,0) 7(-0.665,0) 8(-2,0)
  rect 4.7x4.5 smd: 8(0,-2.5)
  silkscreen extent -2.66,-6.89 2.58,-0.23, body extent -2.9,-6.34 2.9,0.01, height 1.1
"RES: 1206" [mm]
  rect 1x1.6 smd: 1(-1.5,0) 2(1.5,0)
  silkscreen extent -2.3,-1.1 2.3,1.1, body extent -1.65,-0.8 1.55,0.8, height 0.47
"RES: 2512" [mm]
  rect 1x3.3 smd: 1(-3.1,0) 2(3.1,0)
  silkscreen extent -3.8,-1.85 3.8,1.85, body extent -3.17,-1.6 3.18,1.6, height 0.52
"RES: B57237 (NTC)" [mm]
  round 2.2 hole 1: 1(0.3,1.1) 2(7.7,-1.1)
  silkscreen extent -2.1,-1.9 10,2, body extent -2,-1.9 10,1.9, height 13
RES_BPR58-STRAIGHT_KOA [mil]
  rect 65x65 hole 45 paste-99999 mask+0: 1(0,0)
  round 65 hole 45 paste-99999 mask+0: 2(354.33,0)
  silkscreen extent -156,-123 478,123, body extent -118,-118 473,118, height 748
SHDRRA4W80P0X381_1X4_1603X920X754P [mm]
  rect 2.025x2.025 hole 1.35: 1(0,0)
  round 2.025 hole 1.35: 2(3.81,0) 3(7.62,0) 4(11.43,0)
  silkscreen extent -2.3,-1.2 14.03,8.3, body extent -2.3,-1.2 13.73,8, height 7.54
SOIC127P600X175-8N [mm]
  rect 1.525x0.65 smd: 1(-2.712,1.905) 2(-2.712,0.635) 3(-2.712,-0.635) 4(-2.712,-1.905) 5(2.712,-1.905) 6(2.712,-0.635) 7(2.712,0.635) 8(2.712,1.905)
  silkscreen extent -3.47,-2.45 1.6,2.58, body extent -3,-2.45 3,2.45, height 1.75
SOIC127P1030X265-16N [mm]
  rect 1.75x0.65 smd: 1(-4.775,4.445) 2(-4.775,3.175) 3(-4.775,1.905) 4(-4.775,0.635) 5(-4.775,-0.635) 6(-4.775,-1.905) 7(-4.775,-3.175) 8(-4.775,-4.445) 9(4.775,-4.445) 10(4.775,-3.175) 11(4.775,-1.905) 12(4.775,-0.635) 13(4.775,0.635) 14(4.775,1.905) 15(4.775,3.175) 16(4.775,4.445)
  silkscreen extent -5.65,-5.15 3.55,5.15, body extent -5.15,-5.15 5.15,5.15, height 2.65